# Altium PCB InterfaceBoard_MPCB.PcbDoc (part 1 of 3)
Units mil, origin at the board's own origin, x right, y up, seen from the top; angles counter-clockwise.
Board outline 1629.92 x 1653.54 mil, 4 copper layers (Top Layer, Power, Ground, Bottom Layer), stack 61.899 mil thick; 94 components, 58 nets, 296 pads, 186 vias.
Unrouted connection lines stored in the file: 1.
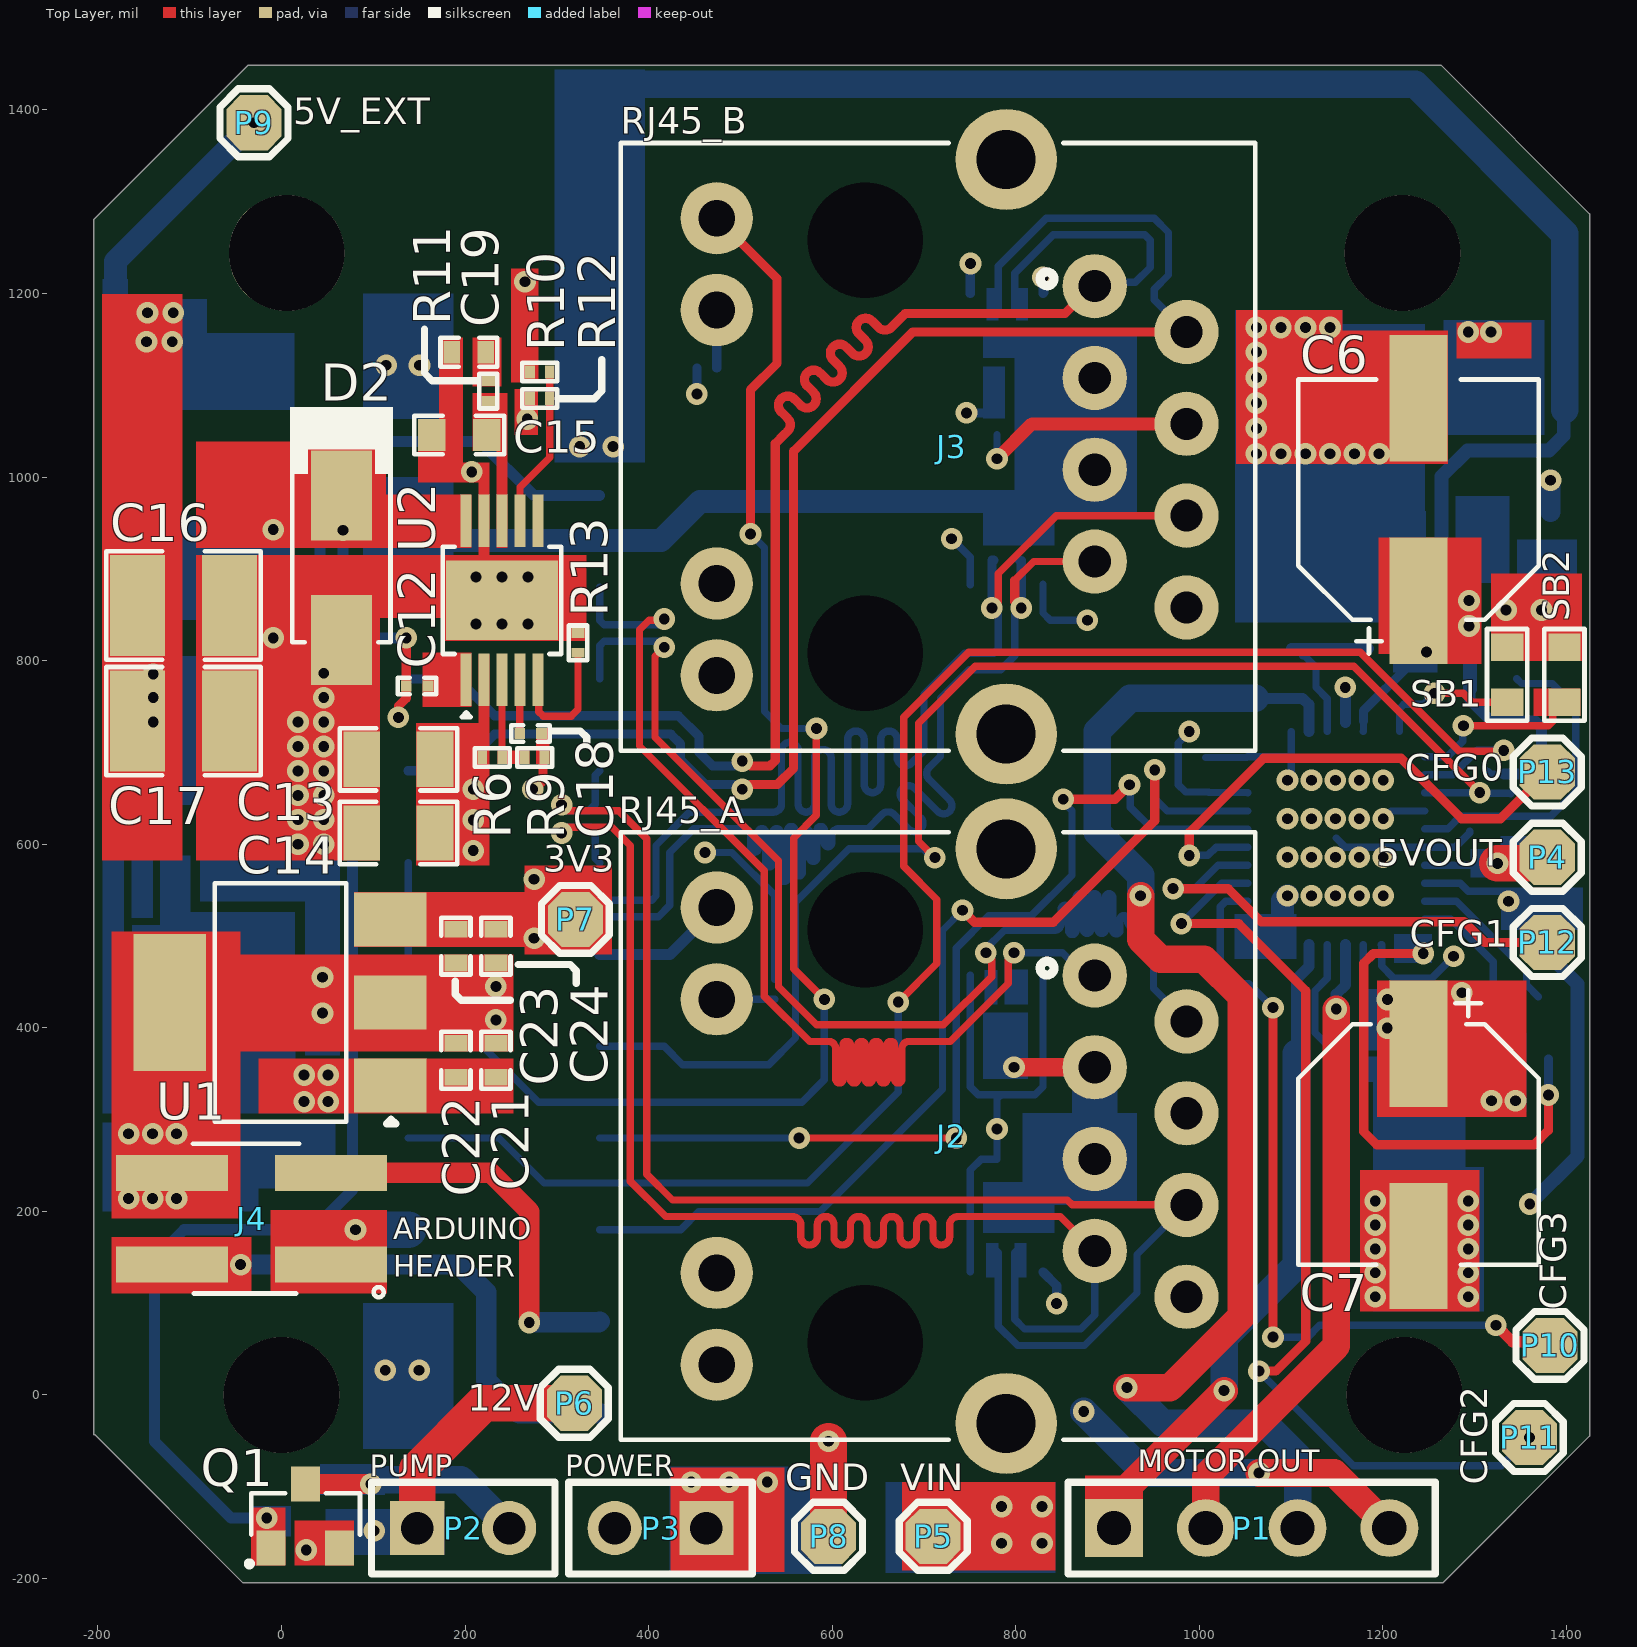
[diagram p0: Top Layer view]
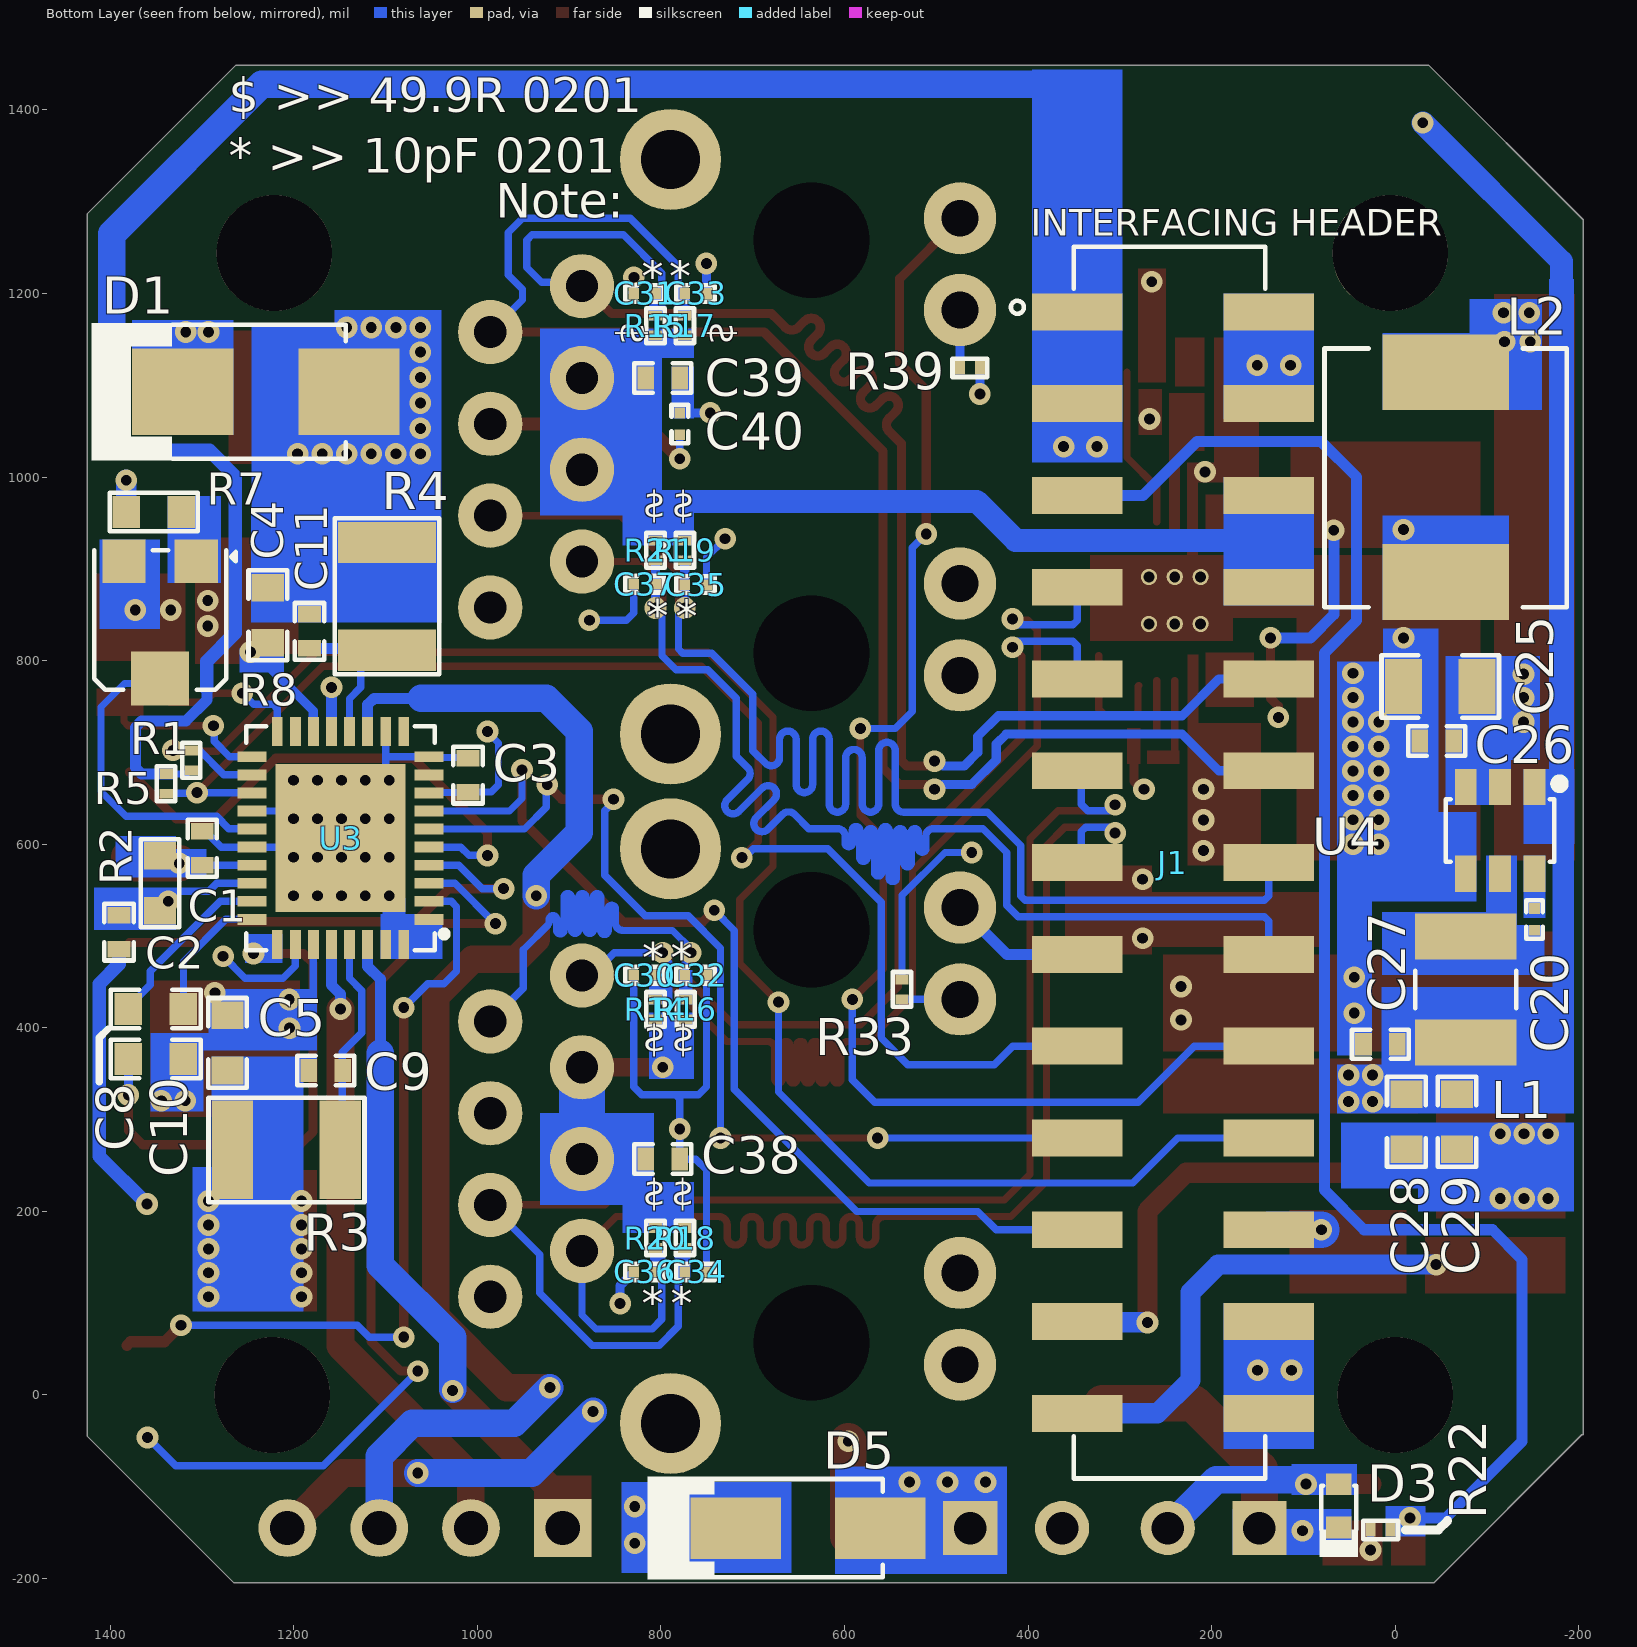
[diagram p1: Bottom Layer view, seen from below]
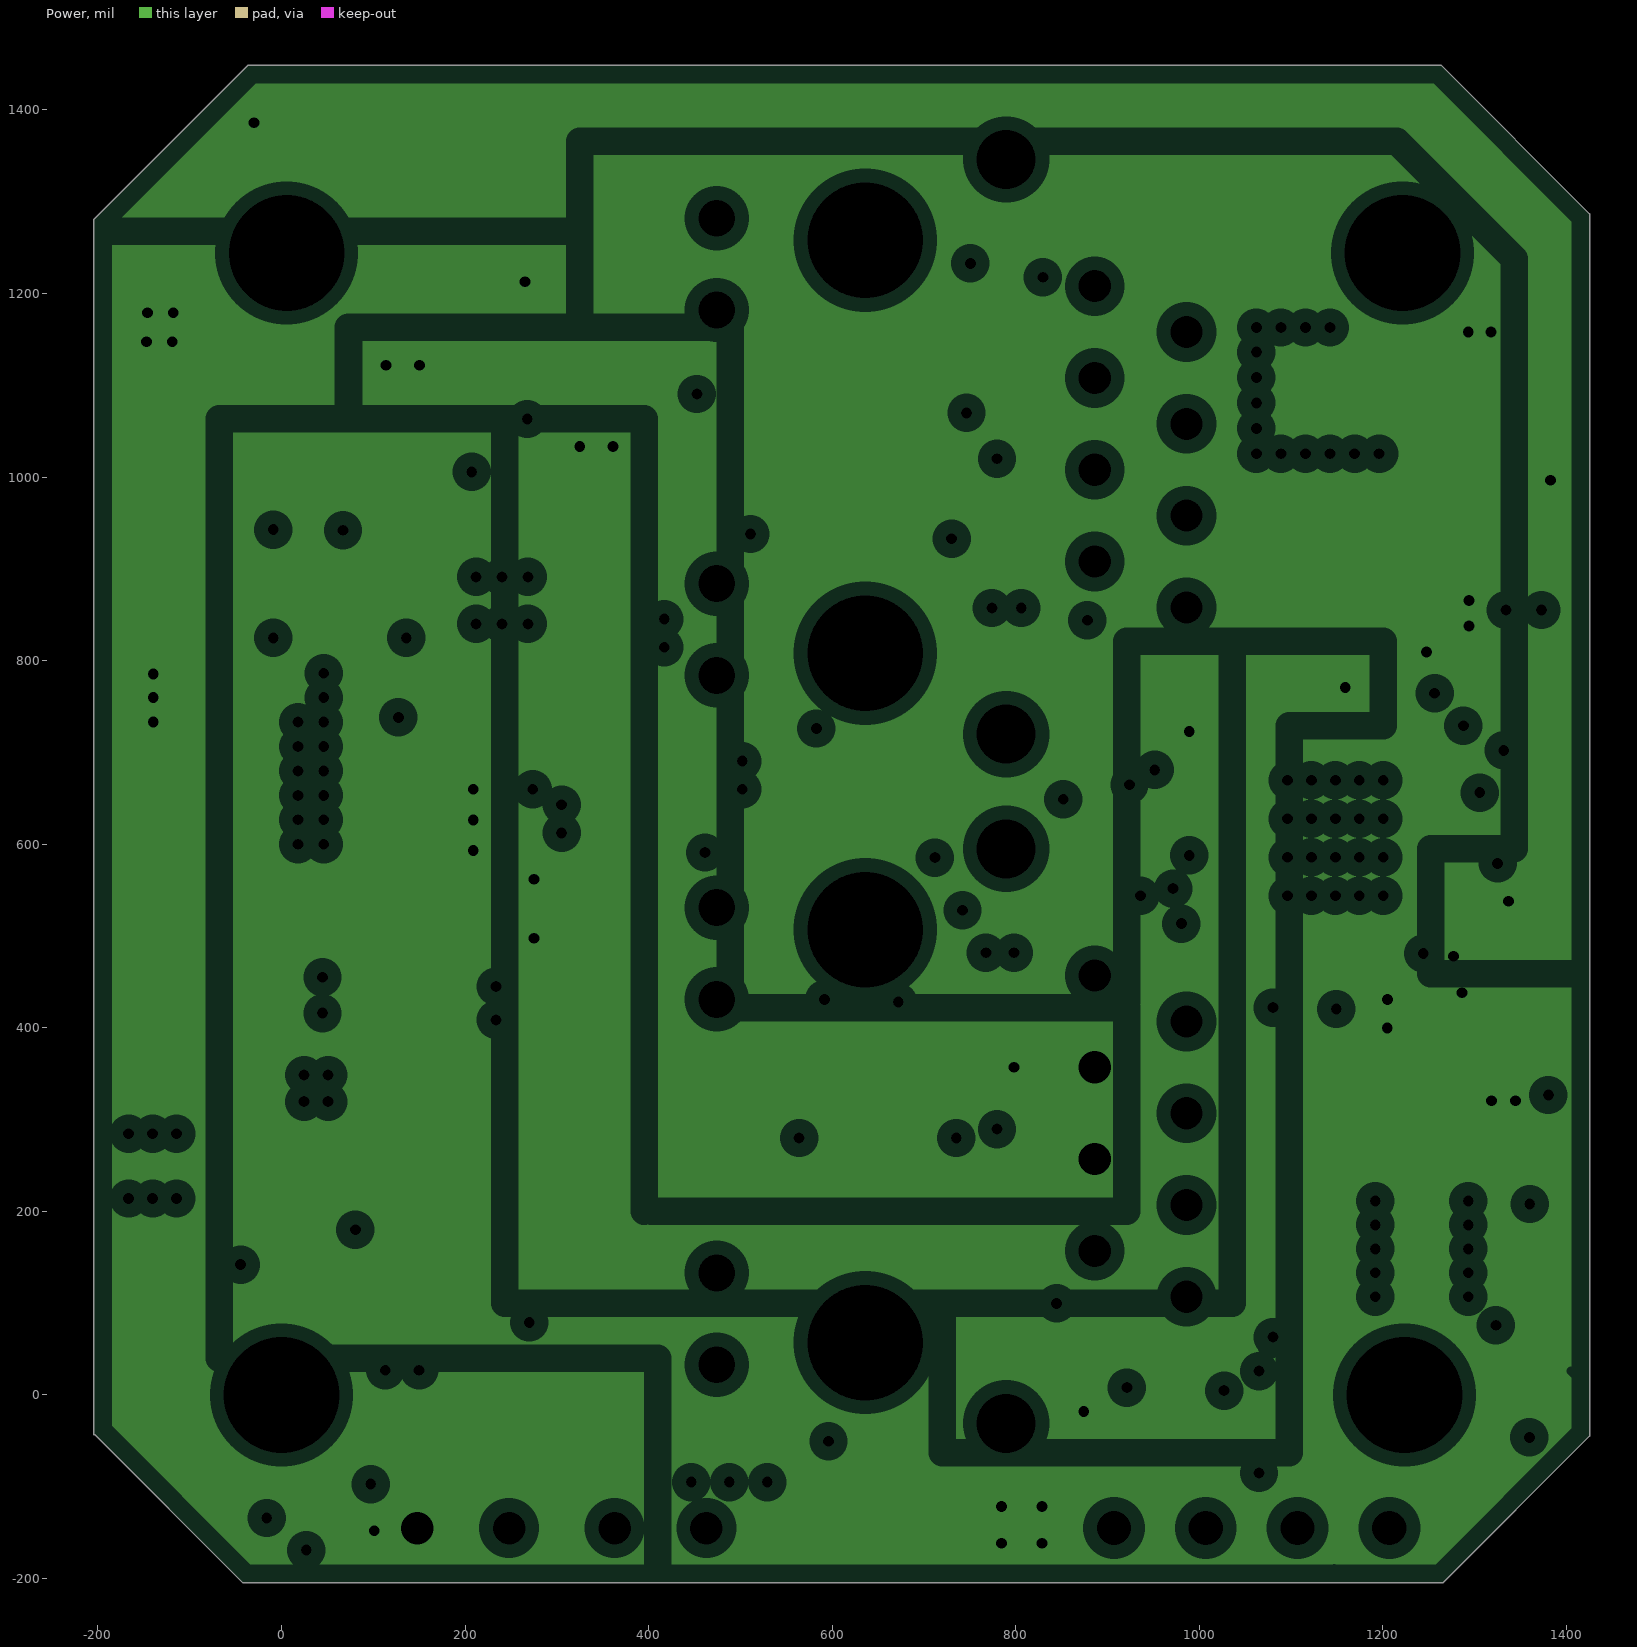
[diagram p2: Power, clearances drawn from the general rule]
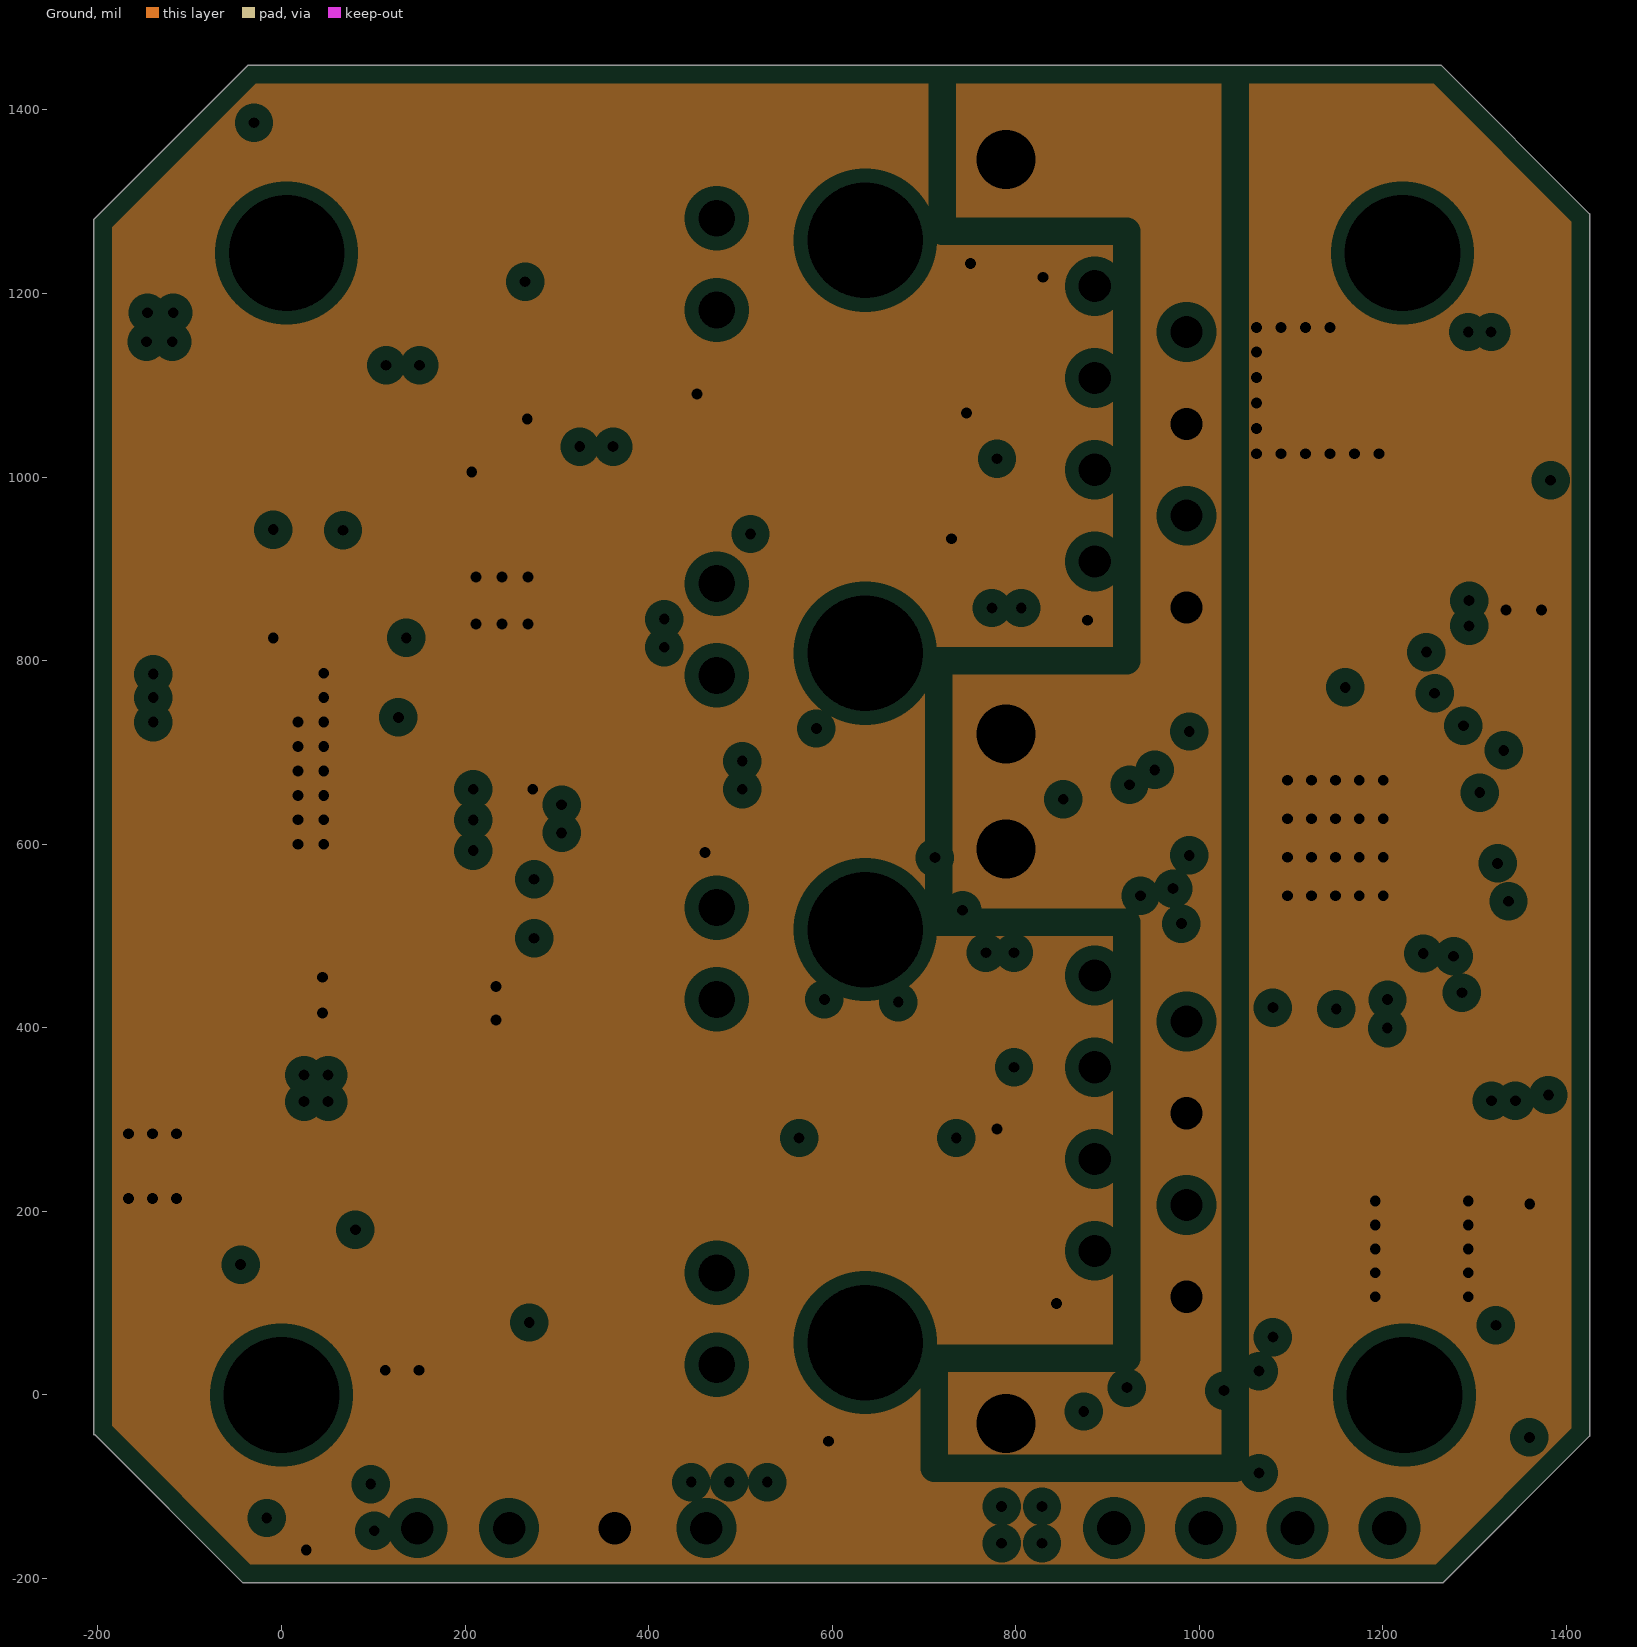
[diagram p3: Ground, clearances drawn from the general rule]
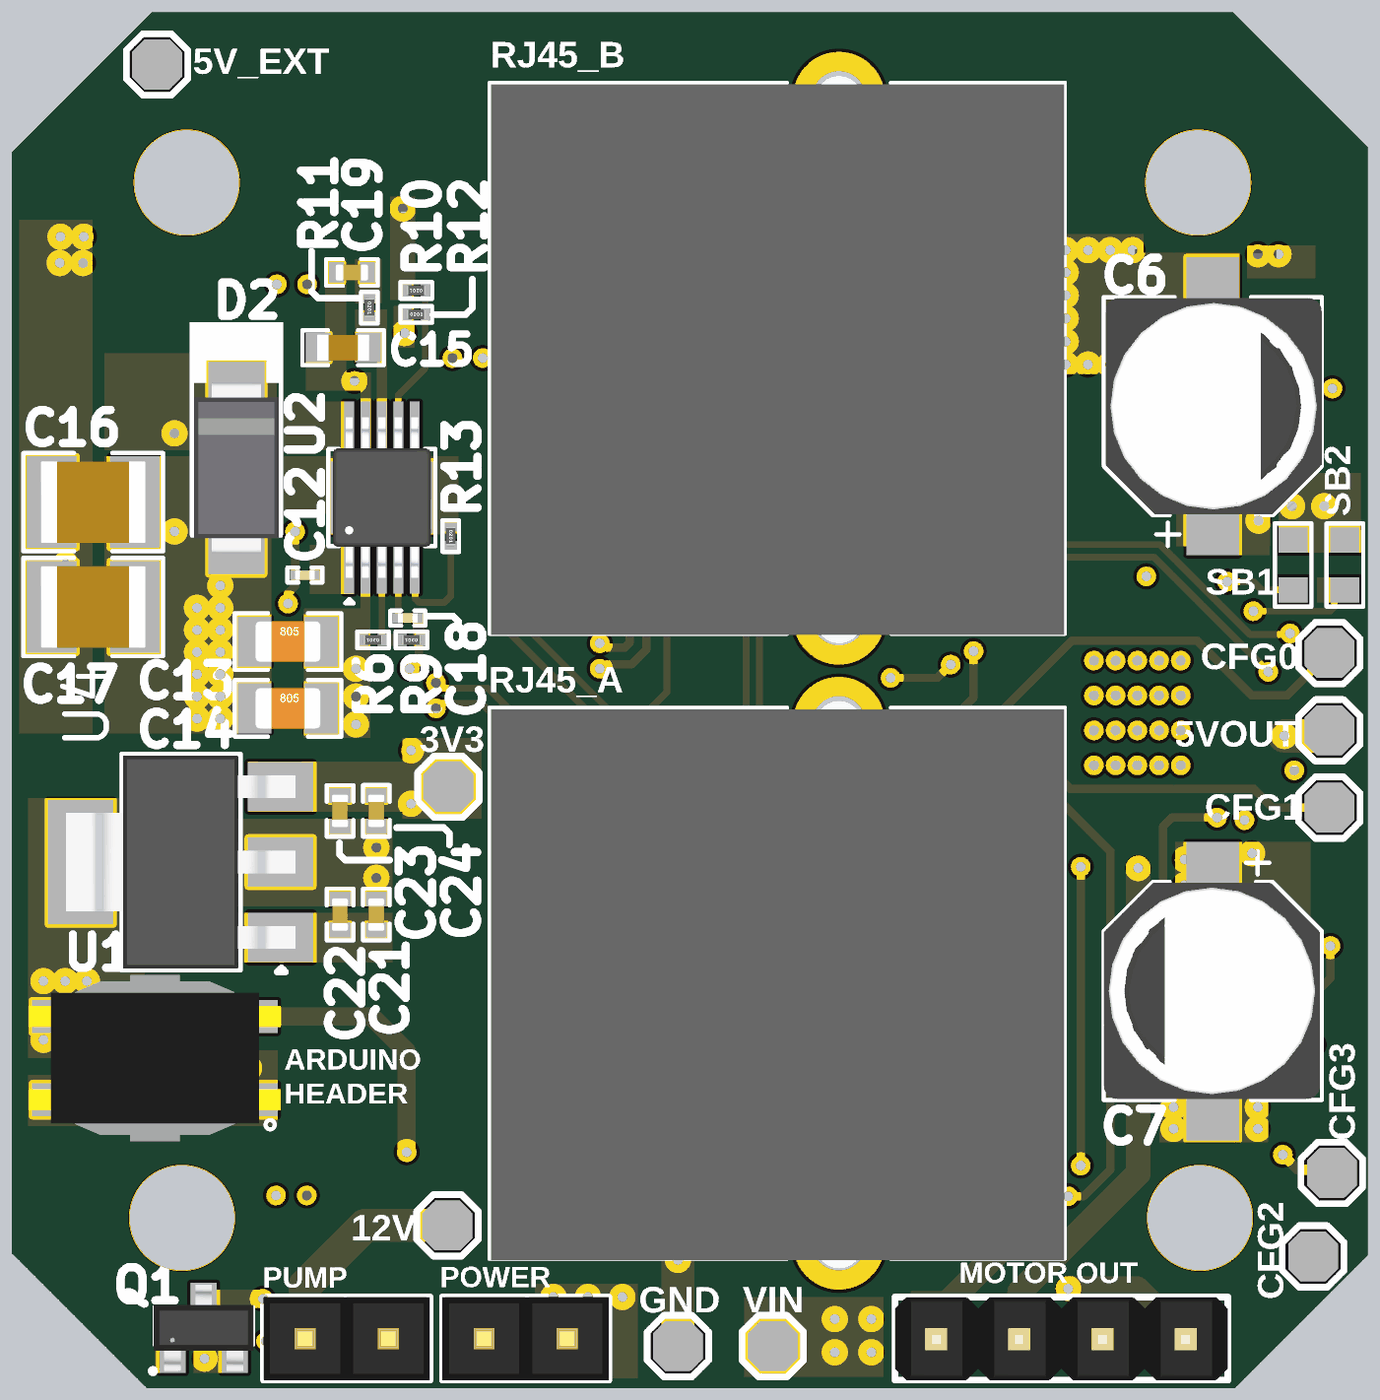
[diagram p5: 3D render of the assembled board from above, using the file's embedded part models]
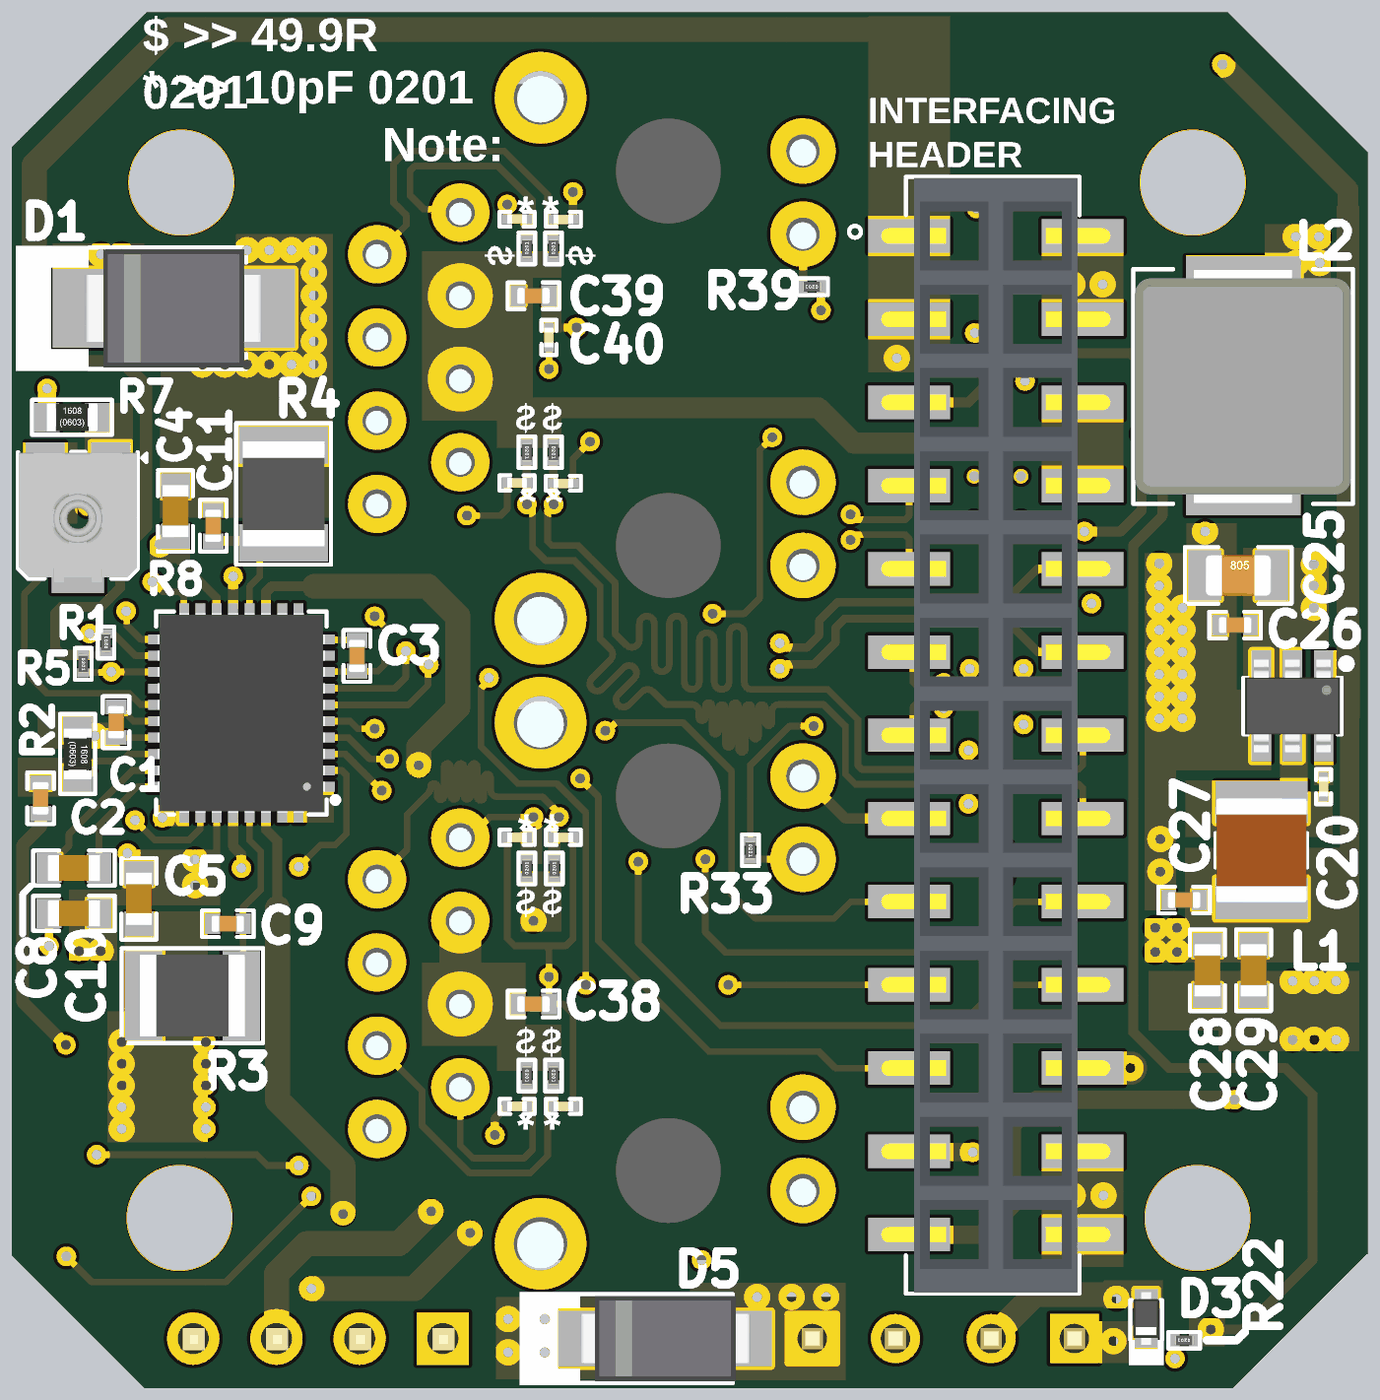
[diagram p6: 3D render of the assembled board from below, using the file's embedded part models]

## Layer stack, top to bottom
Top Solder: solder mask 0.5, Solder Resist, Dk 3.5
Top Layer: signal copper 1.4
Dielectric 2: prepreg 7.874, PP-006, Dk 4.1
Power: plane copper 1.4, net (Multiple Nets)
Dielectric 1: core 40.551, FR-4, Dk 4.8
Ground: plane copper 1.4, net (Multiple Nets)
Dielectric 3: prepreg 7.874, PP-006, Dk 4.1
Bottom Layer: signal copper 1.4
Bottom Solder: solder mask 0.5, Solder Resist, Dk 3.5

## Board outline
-204.73,-43.35 -203.19,-43.35 -41.81,-204.72 1265.27,-204.72 1425.19,-44.8 1425.19,1286.73 1263.1,1448.82 -36.19,1448.82 -204.73,1280.28

## Design rules (kind name [scope] priority, off if disabled: settings)
Clearance Clearance_2 [InDifferentialPairClass('EtherCAT_B_Lines')] p1: gap=7 ignorepadtopadclearanceinfootprint=FALSE except(0: Arc-Hole Track-Hole SMDPad-Hole THPad-Hole Via-Hole Fill-Hole Poly-Hole Region-Hole Text-Hole; 3: Arc-SMDPad Track-SMDPad SMDPad-SMDPad)
Clearance Clearance_1 [InDifferentialPairClass('EtherCAT_A_Lines')] p2: gap=7 ignorepadtopadclearanceinfootprint=FALSE except(0: Arc-Hole Track-Hole SMDPad-Hole THPad-Hole Via-Hole Fill-Hole Poly-Hole Region-Hole Text-Hole; 3: Arc-SMDPad Track-SMDPad SMDPad-SMDPad)
Clearance [All] p3: gap=7 ignorepadtopadclearanceinfootprint=FALSE except(0: Arc-Hole Track-Hole SMDPad-Hole THPad-Hole Via-Hole Fill-Hole Poly-Hole Region-Hole Text-Hole; 3: Arc-SMDPad Track-SMDPad SMDPad-SMDPad)
DiffPairsRouting DiffPairsRouting_1 [InDifferentialPairClass('EtherCAT_A_Lines')] p1: maxlimit=10 minlimit=10 mostfreqgap=10 toplayer_minwidth=8 toplayer_maxwidth=22 toplayer_prefwidth=10 bottomlayer_minwidth=8 bottomlayer_maxwidth=22 bottomlayer_prefwidth=10 maxuncoupledlength=500
DiffPairsRouting [InDifferentialPairClass('EtherCAT_B_Lines')] p2: maxlimit=10 minlimit=10 mostfreqgap=10 toplayer_minwidth=8 toplayer_maxwidth=22 toplayer_prefwidth=10 bottomlayer_minwidth=8 bottomlayer_maxwidth=22 bottomlayer_prefwidth=10 maxuncoupledlength=500
HoleSize [All] p1: absolutevalues=TRUE maxlimit=1000 minlimit=1 maxpercent=80.000 minpercent=20.000
HoleToHoleClearance [All] p1: gap=0 allowstackedmicrovias=TRUE
MatchedLengths "Schematic Matched Net Lengths_1" [InNetClass('EtherCAT_B')] p1: tolerance=20 checknetsindiffpair=FALSE checkdiffpairvsdiffpair=TRUE checkxsignals=TRUE checkothers=TRUE
MatchedLengths "Schematic Matched Net Lengths" [InNetClass('EtherCAT_A')] p2: tolerance=20 checknetsindiffpair=FALSE checkdiffpairvsdiffpair=TRUE checkxsignals=TRUE checkothers=TRUE
MatchedLengths MatchedLengths_1 [InDifferentialPairClass('EtherCAT_B_Lines')] p3: tolerance=20 checknetsindiffpair=FALSE checkdiffpairvsdiffpair=TRUE checkxsignals=TRUE checkothers=TRUE
MatchedLengths [InDifferentialPairClass('EtherCAT_A_Lines')] p4: tolerance=20 checknetsindiffpair=FALSE checkdiffpairvsdiffpair=TRUE checkxsignals=TRUE checkothers=TRUE
MaxMinImpedance "Schematic Impedance Constraint_1" [InNetClass('EtherCAT_A')] p1: minimum=85.00 maximum=95.00
MaxMinImpedance "Schematic Impedance Constraint" [InNetClass('EtherCAT_B')] p2: minimum=85.00 maximum=95.00
MinimumSolderMaskSliver [All] p1: minsoldermaskwidth=0
PlaneClearance [All] p1: clearance=15
PlaneConnect [All] p1: planeconnectstyle=Direct reliefexpansion=15 reliefentries=4 reliefconductorwidth=10 reliefairgap=10
PolygonConnect [All] p1: connectstyle=Direct reliefconductorwidth=10 reliefentries=4 polygonreliefangle="90 Angle" airgapwidth=10
RoutingVias [All] p1: holewidth=11.81 width=23.62 viastyle="Through Hole" minholewidth=11.81 minwidth=23.62 maxholewidth=11.81 maxwidth=23.62
SilkToSilkClearance [All] p1: silktosilkclearance=0
SilkToSolderMaskClearance [IsPad] p1: minsilkscreentomaskgap=0 clearancetoexposedcopper=TRUE
SolderMaskExpansion [All] p1: expansion=4 istentingtop=FALSE
UnRoutedNet [All] p1: checkbadconnections=TRUE
Width [All] p1: maxlimit=50 minlimit=8 preferedwidth=22 minimp=50.000000 maximp=50.000000 favimp=50.000000
21 further rules are at their usual default settings.

## Classes and differential pairs
differential pair class EtherCAT_B_Lines: RXB TXB
differential pair class EtherCAT_A_Lines: RXA TXA
net class EtherCAT_B: RXB_N RXB_P TXB_N TXB_P
net class EtherCAT_A: RXA_N RXA_P TXA_N TXA_P
component class U_Stepper-Driver: C1 C2 C3 C4 C5 C6 C7 C8 C9 C10 C11 D1 P4 P5 P7 P8 P9 P10 P11 P12 P13 R1 R2 R3 R4 R5 R7 R8 s SB1 SB2 U3
component class U_Power-Section: C12 C13 C14 C15 C16 C17 C18 C19 C20 C21 C22 C23 C24 C25 C26 C27 C28 C29 D2 l L1 L2 P6 R6 R9 R10 R11 R12 R13 U1 U2 U4
component class U_Connector_Section: C30 C31 C32 C33 C34 C35 C36 C37 C38 C39 C40 D3 D5 J1 J2 J3 J4 P1 P2 P3 Q1 R14 R15 R16 R17 R18 R19 R20 R21 R22 R33 R39
differential pair TXB: +TXB_P -TXB_N
differential pair TXA: +TXA_P -TXA_N
differential pair RXB: +RXB_P -RXB_N
differential pair RXA: +RXA_P -RXA_N

## Components (designator, comment, footprint, x,y, rotation, side; value= is the part's Value field where it differs from the comment)
C1 "4.7uF" Cap-0402 1299.75,595.69 r270 bottom locked
C2 "470nF" Cap-0402 1390.4,504.32 r90 bottom locked
C3 "0.1uF" Cap-0402 1010.24,675.36 r270 bottom locked
C4 "0.1uF" Cap0603 1228.34,849.36 r90 bottom locked
C5 "0.1uF" Cap0603 1272.25,383.48 r270 bottom locked
C6 "100uF" RVT1H101M0607 1238.84,975.6 r90 top locked
C7 "100uF" RVT1H101M0607 1238.84,272.53 r270 top locked
C8 "22nF" Cap0603 1350.24,420.46 r180 bottom locked
C9 "0.1uF" Cap-0402 1165.38,353.48 r180 bottom locked
C10 "0.1uF" Cap0603 1350.24,365.98 r180 bottom locked
C11 "0.1uF" Cap-0402 1183,831.86 r270 bottom locked
C12 "100nF" CAP-0201 147.74,772.49 r180 top locked
C13 "10uF" Cap-0805 127.36,692.57 r0 top locked
C14 "10uF" Cap-0805 127.36,612.31 r0 top locked
C15 "6.8pF" Cap-0603 193.61,1045.71 r0 top locked
C16 "100uF" Cap-1210 -106.75,860.1 r180 top locked
C17 "100uF" Cap-1210 -106.75,734.1 r180 top locked
C18 "6.8nF" CAP-0201 271.32,720.76 r180 top locked
C19 "3nF" Cap-0402 204.24,1136 r0 top locked
C20 "100nF" CAP-0201 -151.59,518.13 r270 bottom locked
C21 "1uF" Cap-0402 233.54,364.58 r270 top locked
C22 "0.1uF" Cap-0402 189.94,364.58 r270 top locked
C23 "0.1uF" Cap-0402 189.94,489.1 r90 top locked
C24 "1uF" Cap-0402 233.54,489.11 r90 top locked
C25 "10uF" Cap-0805 -49,772 r180 bottom locked
C26 "0.1uF" Cap-0402 -45.25,712.44 r180 bottom locked
C27 "0.1uF" Cap-0402 16.12,382.08 r180 bottom locked
C28 "22uF" Cap-0603 -12.03,297.58 r90 bottom locked
C29 "22uF" Cap-0603 -67.43,297.58 r90 bottom locked
C30 "10pF" CAP-0201 817.81,457.28 r0 bottom locked
C31 "10pF" CAP-0201 817.81,1200.05 r0 bottom locked
C32 "10pF" CAP-0201 762.2,457.28 r180 bottom locked
C33 "10pF" CAP-0201 762.2,1200.04 r180 bottom locked
C34 "10pF" CAP-0201 762.2,134.01 r180 bottom locked
C35 "10pF" CAP-0201 762.2,882.78 r180 bottom locked
C36 "10pF" CAP-0201 817.81,134.01 r0 bottom locked
C37 "10pF" CAP-0201 817.81,883.23 r0 bottom locked
C38 "22nF" Cap-0402 798,256.98 r180 bottom locked
C39 "22nF" Cap-0402 798,1108.01 r180 bottom locked
C40 "1nF" CAP-0201 779.5,1058.01 r90 bottom locked
D1 "SMBJ43A" SMB_ 1230.45,1093 r0 bottom locked
D2 "SS56" SMA 65.36,901.24 r270 top locked
D3 "MSK4010" MSK4010 61.66,-120.78 r270 bottom locked value=Custom
D5 "SS36" SMA 639.74,-145 r180 bottom locked
J1 "PHF254SMD-x" PHF254SMD-x 242.32,580 r270 bottom locked
J2 "HY951180A" HY951180A. 730.09,281.98 r90 top
J3 "HY951180A" HY951180A. 730.09,1033.01 r90 top locked
J4 "1125N1202SNM" 1125N1202SNM -32.62,192 r90 top locked
L1 "4.7uH" IND-1210 -76.79,441.71 r270 bottom locked
L2 "68uH" PSPMAA0605H-680M-IGF -54.87,1000.08 r90 bottom
P1 "B-2100S04P-A110" HDR1X4_ 906.99,-145 r0 top locked
P2 "826629-2" HDR1X2 147.99,-145 r0 top locked
P3 "826629-2" HDR1X2 462.99,-145 r180 top locked
P4 "Test Point" "TEST POINT" 1379,585.85 r0 top locked
P5 "Test Point" "TEST POINT" 710,-154 r270 top locked
P6 "Test Point" "TEST POINT" 319,-9 r0 top locked
P7 "Test Point" "TEST POINT" 320.2,518.13 r0 top locked
P8 "Test Point" "TEST POINT" 596,-154 r0 top locked
P9 "Test Point" "TEST POINT" -30,1386 r0 top locked
P10 "TEST POINT" Test-point 1382,54 r0 top locked
P11 "TEST POINT" Test-point 1359.5,-46.24 r0 top locked
P12 "TEST POINT" Test-point 1379,493 r0 top locked
P13 "TEST POINT" Test-point 1379,678.71 r0 top locked
Q1 "IRLML2502TRPBF" IRLML2502TRPBF 26,-132 r0 top locked
R1 "10K" Res-0201 1311.75,691.41 r90 bottom locked
R2 "10R" Res-0603 1345.88,557.5 r90 bottom locked
R3 "110mR" Res_1210 1208,267 r0 bottom locked
R4 "110mR" Res_1210 1098.39,870.02 r90 bottom locked
R5 "10K" Res-0201 1339.14,665.76 r270 bottom locked
R6 "105K" Res-0201 229.57,694.58 r180 top locked value=105kR
R7 "20K" Res-0603 1352.64,962 r0 bottom locked
R8 "DNP" VG039NCHXTB203 1345.64,844.44 r0 bottom locked
R9 "7.87k" Res-0201 275.83,694.57 r180 top locked
R10 "140K" Res-0201 281.52,1114.49 r180 top locked
R11 "105K" Res-0201 225.24,1093.72 r270 top locked value=105kR
R12 "10K" Res-0201 281.52,1085.72 r0 top locked
R13 "681K" Res-0201 323.01,819.31 r270 top locked
R14 "49.9R" Res-0201 806,420 r90 bottom locked
R15 "49.9R" Res-0201 806,1165 r90 bottom locked
R16 "49.9R" Res-0201 773.02,420 r90 bottom locked
R17 "49.9R" Res-0201 774.02,1165 r90 bottom locked
R18 "49.9R" Res-0201 774.02,171 r270 bottom locked
R19 "49.9R" Res-0201 774.02,920.18 r270 bottom locked
R20 "49.9R" Res-0201 806,171 r270 bottom locked
R21 "49.9R" Res-0201 806,920.18 r270 bottom locked
R22 "10K" Res-0201 16,-147 r0 bottom locked
R33 "330R" Res-0201 537.35,441.83 r270 bottom locked
R39 "330R" Res-0201 463.36,1119 r0 bottom locked
SB1 "Solder Bridge" "Solder Bridge" 1335.39,784.53 r90 top locked
SB2 "Solder Bridge" "Solder Bridge" 1397.64,784.53 r90 top locked
U1 "BL8071CLATR33" "SOT- 223" -1.63,427.58 r90 top locked
U2 "TPS54240DGQR" "10-HVSSOP - New" 240.24,865.62 r90 top locked
U3 "TMC2130-LA-T" TMC2130-LA-T 1149.13,606.72 r0 bottom locked
U4 "AP63205WU-7" TSOT-23-6 -114.19,615.08 r270 bottom locked

## Footprints (in the part's own frame and the unit in brackets; to place one, negate y for a bottom-side part, rotate by r counter-clockwise, add the part's x,y. Pads: shape width x height; smd on the part's side, far side on the other; paste and mask are expansions set on the pad)
"10-HVSSOP - New" [mm] "IC BATT CHG LI-ION 1CELL 10MSOP"
  rect 1.45x0.3 smd: 1(-2.2,1) 2(-2.2,0.5) 3(-2.2,0) 4(-2.2,-0.5) 5(-2.2,-1) 6(2.2,-1) 7(2.2,-0.5) 8(2.2,0) 9(2.2,0.5) 10(2.2,1)
  round 0.45 hole 0.3: 11(-0.65,-0.716) 11(-0.65,0) 11(-0.65,0.716) 11(0.65,-0.716) 11(0.65,0) 11(0.65,0.716)
  rect 2.2x3.1 smd: 11(0,0)
  silkscreen extent -3.23,-1.64 1.48,1.64, body extent -2.45,-1.5 2.45,1.5, height 1.1
1125N1202SNM [mm] "CONN HEADER 4 POS 2.54mm SMD"
  rect 1x3.1 smd: 1(-1.27,-2.2) 2(-1.27,2.2) 3(1.27,-2.2) 4(1.27,2.2)
  silkscreen extent -2.17,-3.66 2.07,1.62, body extent -2.54,-3.85 2.54,3.85, height 10.88
Cap0603 [mil]
  rect 30x35 smd mask+2.36: 1(-30,0) 2(30,0)
  silkscreen extent -49,-21 49,21, body extent -32,-16 31,16, height 34
CAP-0201 [mm]
  rect 0.3x0.3 smd mask+0.055: 1(-0.3,0) 2(0.3,0)
  silkscreen extent -0.53,-0.23 0.53,0.23, body extent -0.3,-0.15 0.3,0.15, height 0.28
Cap-0402 [mil]
  rect 18x25 smd mask+2.36: 1(-18.5,0) 2(18.5,0)
  silkscreen extent -31,-16 31,16, body extent -20,-10 20,10, height 19
Cap-0603 [mil]
  rect 30x35 smd mask+2.36: 1(-30,0) 2(30,0)
  silkscreen extent -49,-21 49,21, body extent -32,-16 31,16, height 34
Cap-0805 [mil] "SMD 0805"
  rect 40x60 smd mask+2.76: 1(-40,0) 2(40,0)
  silkscreen extent -64,-34 64,34, body extent -39,-25 39,25, height 30
Cap-1210 [mil] "SMD 1210"
  rect 60x110 smd: 1(-50,0) 2(50,0)
  silkscreen extent -84,-59 84,59, body extent -63,-49 63,49, height 39
HDR1X2 [mm] "CONN HEADER VERT 2POS 2.54MM"
  rect 1.5x1.5 hole 0.9: 1(0,0)
  round 1.5 hole 0.9: 2(2.54,0)
  silkscreen extent -1.27,-1.27 3.81,1.27, body extent -1.27,-1.27 3.81,1.27, height 8.44
HDR1X4_ [mm] "Connector; Header; 4 Position"
  rect 1.6x1.6 hole 0.95: 1(0,0)
  round 1.6 hole 0.95: 2(2.54,0) 3(5.08,0) 4(7.62,0)
  silkscreen extent -1.27,-1.27 8.89,1.27, body extent -1.27,-1.27 8.89,1.27, height 9.5
HY951180A. [mm]
  round 1.78 hole 0.89: 1(4.445,-3.96) 2(3.175,-6.5) 3(1.905,-3.96) 4(0.635,-6.5) 5(-0.635,-3.96) 6(-1.905,-6.5) 7(-3.175,-3.96) 8(-4.445,-6.5)
  round 2 hole 1.02: 9(6.325,6.5) 10(3.785,6.5) 11(-3.785,6.5) 12(-6.325,6.5)
  round 0 hole 3.2 unplated: MH1(-5.715,2.39) MH2(5.715,2.39)
  round 2.8 hole 1.63: "Shield 1"(-7.95,-1.51) "Shield 2"(7.95,-1.51)
  silkscreen extent -8.41,-8.41 8.41,9.16, body extent -8.7,-8.38 8.62,9.12, height 17.6
IND-1210 [mm]
  rect 1.27x2.81 smd: 1(-1.471,0) 2(1.471,0)
  silkscreen extent -0.52,-1.4 0.52,1.4, body extent -1.6,-1.4 1.6,1.4, height 2.5
IRLML2502TRPBF [mm] "MOSFET N-CH 20V 4.2A SOT23"
  rect 0.802x0.972 smd: 1(-0.95,-0.885) 2(0.95,-0.885) 3(0,0.885)
  silkscreen extent -1.57,-1.35 1.51,0.64, body extent -1.52,-1.32 1.52,1.32, height 1.12
MSK4010 [mm] "SOD-523 Schottky Barrier Diodes (SBD) ROHS"
  rect 0.6x0.7 smd: 1(-0.6,0) 2(0.6,0)
  silkscreen extent -0.56,-0.53 1.42,0.53, body extent -0.8,-0.4 0.8,0.4, height 0.7
PHF254SMD-x [mm]
  rect 1.02x2.5 smd: 1(-15.24,-2.65) 2(-15.24,2.65) 3(-12.7,-2.65) 4(-12.7,2.65) 5(-10.16,-2.65) 6(-10.16,2.65) 7(-7.62,-2.65) 8(-7.62,2.65) 9(-5.08,-2.65) 10(-5.08,2.65) 11(-2.54,-2.65) 12(-2.54,2.65) 13(0,-2.65) 14(0,2.65) 15(2.54,-2.65) 16(2.54,2.65) 17(5.08,-2.65) 18(5.08,2.65) 19(7.62,-2.65) 20(7.62,2.65) 21(10.16,-2.65) 22(10.16,2.65) 23(12.7,-2.65) 24(12.7,2.65) 25(15.24,-2.65) 26(15.24,2.65)
  silkscreen extent -17.04,-4.48 17.04,2.55, body extent -17.01,-3.5 17.01,3.5, height 8.5
PSPMAA0605H-680M-IGF [mm]
  rect 2.1x3.5 smd: 1(-2.9,0) 2(2.9,0)
  silkscreen extent -3.61,-3.35 3.56,3.35, body extent -3.57,-3.29 3.53,3.31, height 5
Res-0201 [mm]
  rect 0.27x0.37 smd mask+0.055: 1(-0.275,0) 2(0.275,0)
  silkscreen extent -0.48,-0.25 0.48,0.25, body extent -0.3,-0.15 0.3,0.15, height 0.29
Res-0603 [mil]
  rect 30x35 smd: 1(-30,0) 2(30,0)
  silkscreen extent -48,-21 48,21, body extent -31,-17 31,17, height 18
Res_1210 [mm]
  rect 1.14x2.72 smd: 1(-1.49,0) 2(1.49,0)
  silkscreen extent -2.16,-1.45 2.16,1.45, body extent -1.6,-1.25 1.6,1.25, height 0.7
RVT1H101M0607 [mm]
  rect 3.5x1.6 smd: 1(-2.8,0) 2(2.8,0)
  silkscreen extent -4.27,-3.33 3.32,3.33, body extent -3.31,-3.33 3.29,3.27, height 7.94
SMA [mm]
  rect 2.5x1.7 smd: 1(-2,0) 2(2,0)
  silkscreen extent -4.44,-1.42 2.06,1.42, body extent -2.6,-1.3 2.6,1.3, height 2.4
SMB_ [mm]
  rect 2.8x2.4 smd: 1(-2.3,0) 2(2.3,0)
  silkscreen extent -2.21,-1.91 4.83,1.91, body extent -2.7,-1.8 2.7,1.8, height 2.3
"Solder Bridge" [mil] "Solder Bridge ON"
  rect 30x35 smd: 1(-30,0) 2(30,0)
  silkscreen extent -50,-22 50,22
"SOT- 223" [mm]
  rect 1.5x2 smd: 1(-2.3,-3.05) 2(0,-3.05) 3(2.3,-3.05)
  rect 3.8x2 smd: 4(0,3.05)
  silkscreen extent -3.35,-3.2 3.3,1.8, body extent -3.25,-3.5 3.25,3.5, height 1.61
"TEST POINT" [mil]
  oct 60x60 smd: 1(0,0)
  silkscreen extent -37,-37 37,37
Test-point [mil]
  oct 60x60 smd: 1(0,0)
  silkscreen extent -37,-37 37,37
TMC2130-LA-T [mm]
  rect 0.8x0.3 smd: 1(-2.45,2.25) 2(-2.45,1.75) 3(-2.45,1.25) 4(-2.45,0.75) 5(-2.45,0.25) 6(-2.45,-0.25) 7(-2.45,-0.75) 8(-2.45,-1.25) 9(-2.45,-1.75) 10(-2.45,-2.25) 19(2.45,-2.25) 20(2.45,-1.75) 21(2.45,-1.25) 22(2.45,-0.75) 23(2.45,-0.25) 24(2.45,0.25) 25(2.45,0.75) 26(2.45,1.25) 27(2.45,1.75) 28(2.45,2.25)
  rect 0.3x0.8 smd: 11(-1.75,-2.95) 12(-1.25,-2.95) 13(-0.75,-2.95) 14(-0.25,-2.95) 15(0.25,-2.95) 16(0.75,-2.95) 17(1.25,-2.95) 18(1.75,-2.95) 29(1.75,2.95) 30(1.25,2.95) 31(0.75,2.95) 32(0.25,2.95) 33(-0.25,2.95) 34(-0.75,2.95) 35(-1.25,2.95) 36(-1.75,2.95)
  rect 3.6x4.1 smd: 37(0,0)
  silkscreen extent -2.92,-3.1 2.6,3.1, body extent -2.55,-3.05 2.55,3.05, height 0.84
TSOT-23-6 [mm]
  rect 1x0.6 smd: 1(-1.2,0.95) 2(-1.2,0) 3(-1.2,-0.95) 4(1.2,-0.95) 5(1.2,0) 6(1.2,0.95)
  silkscreen extent -0.86,-1.5 0.86,1.5, body extent -1.41,-1.45 1.41,1.45, height 1
VG039NCHXTB203 [mm]
  rect 1.2x1.2 smd: 1(-1,-1.625) 3(1,-1.625)
  rect 1.6x1.5 smd: 2(0,1.625)
  silkscreen extent -2.09,-1.93 1.83,1.94, body extent -1.8,-1.91 1.8,2.05, height 1.13

## Part data
C1: library part CC0402KRX5R6BB475, "CAP CER 4.7UF 10V X5R 0402", Case Code (Imperial)=0402, Case Code (Metric)=1005, LCSC Part Number=C326586, Manufacturer=Yageo, Max Operating Temperature=85°C, Min Operating Temperature=-55°C, Supplier Part Number 1=3871698, Tolerance=10%, Voltage Rating=10V, Capacitance=4.7uF, Case/Package=0402, Category="Ceramic Capacitors", ComponentLink1Description=http://www.yageo.com/documents/recent/UPY-GPHC_X5R_4V-to-50V_25.pdf?src-supplier=Digi-Key, ComponentLink1URL=http://www.yageo.com/documents/recent/UPY-GPHC_X5R_4V-to-50V_25.pdf?src-supplier=Digi-Key, Manufacturer Part Number=CC0402KRX5R6BB475, Mount="Surface Mount", Packaging="Cut Tape", Pricing 1="10000=0.02310, 50000=0.02100 (GBP)", RoHS=Yes, RoHS Compliant=Yes, Stock 1=20000, Supplier 1=Farnell
C2: library part CC0402KRX5R7BB474, "CAP CER 0.47UF 16V X5R 0402", Case/Package=0402, LCSC Part Number=C527010, Manufacturer=Yageo, Max Operating Temperature=85°C, Min Operating Temperature=-55°C, Supplier Part Number 1=1070400, Tolerance=10%, Voltage Rating=16V, Capacitance=470nF, Category="Ceramic Capacitors", ComponentLink1Description=http://www.yageo.com/documents/recent/UPY-GPHC_X5R_4V-to-50V_25.pdf?src-supplier=Digi-Key, ComponentLink1URL=http://www.yageo.com/documents/recent/UPY-GPHC_X5R_4V-to-50V_25.pdf?src-supplier=Digi-Key, ComponentLink2Description=http://www.yageo.com/exep/pages/download/literatures/ProductSelectionGuide%202014_Final_2.pdf?src-supplier=Digi-Key, ComponentLink2URL=http://www.yageo.com/exep/pages/download/literatures/ProductSelectionGuide%202014_Final_2.pdf?src-supplier=Digi-Key, Halogen Free="Halogen Free", Item Type=Capacitor, Lead Free="Lead Free", Length=0.039inch, Manufacturer Part Number=CC0402KRX5R7BB474, Mount="Surface Mount", Packaging="Tape and Reel", Pricing 1="10000=0.01840, 20000=0.01800, 40000=0.01760, 50000=0.01750, 150000=0.01670 (USD)", RoHS=Yes, RoHS Compliant=Yes, Stock 1=10000, Supplier 1="Future Electronics", Thickness=0.022inch, Voltage Rating (DC)=16V, Width=0.02inch
C3 C9 C11 C22 C23 C26 C27: library part CC0402KRX7R8BB104, "CAP CER 0.1UF 25V X7R 0402", Capacitance=100nF, Case Code (Imperial)=0402, Case Code (Metric)=1005, Dielectric=X7R, LCSC Part Number=C105883, Manufacturer=Yageo, Max Operating Temperature=125°C, Min Operating Temperature=-55°C, Resistor Type=Ceramic, Supplier Part Number 1=311-2077-1-ND, Tolerance=10%, Voltage Rating=25V, Case/Package=0402, Category="Ceramic Capacitors", ComponentLink1Description=https://datasheet.ciiva.com/11464/upy-gphc-x7r-6-3v-to-50v-8-11464889.pdf?src-supplier=Avnet, ComponentLink1URL=https://datasheet.ciiva.com/11464/upy-gphc-x7r-6-3v-to-50v-8-11464889.pdf?src-supplier=Avnet, ComponentLink2Description=https://datasheet.ciiva.com/13210/upy-gphc-x7r-6-3v-to-50v-8-12304-13210908.pdf?src-supplier=Mouser, ComponentLink2URL=https://datasheet.ciiva.com/13210/upy-gphc-x7r-6-3v-to-50v-8-12304-13210908.pdf?src-supplier=Mouser, ComponentLink3Description=https://datasheet.ciiva.com/17437/upy-gphc-x7r-6-3v-to-50v-8-17437357.pdf?src-supplier=Avnet+Europe, ComponentLink3URL=https://datasheet.ciiva.com/17437/upy-gphc-x7r-6-3v-to-50v-8-17437357.pdf?src-supplier=Avnet+Europe, Depth=0.5mm, Dissipation Factor=3.5%, Halogen Free="Halogen Free", Height=0.5mm, Lead Free="Lead Free", Length=1mm, Manufacturer Part Number=CC0402KRX7R8BB104, Mount="Surface Mount", Packaging="Tape and Reel", Pricing 1="1=0.10000, 10=0.03100, 50=0.01700, 100=0.01390, 500=0.00990, 1000=0.00777, 2500=0.00707, 5000=0.00650 (USD)", Radiation Hardening=No, RoHS=Yes, Stock 1=1841009, Supplier 1=Digi-Key, Termination=SMD/SMT, Thickness=0.022inch, Voltage Rating (DC)=25V, Width=0.02inch
C4 C5 C10: library part CC0603KRX7R0BB104, "CAP CER 0.1UF 100V X7R 0603", Capacitance=100nF, Case Code (Imperial)=0603, Case Code (Metric)=1608, Dielectric=X7R, Manufacturer=Yageo, Max Operating Temperature=125°C, Min Operating Temperature=-55°C, Package Quantity=4000, Resistor Type=Ceramic, Supplier Part Number 1=311-1523-1-ND, Tolerance=10%, Voltage Rating=100V, Case/Package=0603, Category="Ceramic Capacitors", ComponentLink1Description=https://datasheet.ciiva.com/6277/mlccorderingcode-6277030.pdf?src-supplier=Digi-Key, ComponentLink1URL=https://datasheet.ciiva.com/6277/mlccorderingcode-6277030.pdf?src-supplier=Digi-Key, ComponentLink2Description=https://datasheet.ciiva.com/6277/mlccorderingcode-6277081.pdf?src-supplier=Digi-Key, ComponentLink2URL=https://datasheet.ciiva.com/6277/mlccorderingcode-6277081.pdf?src-supplier=Digi-Key, ComponentLink3Description=https://datasheet.ciiva.com/6277/mlccorderingcode-6277082.pdf?src-supplier=Digi-Key, ComponentLink3URL=https://datasheet.ciiva.com/6277/mlccorderingcode-6277082.pdf?src-supplier=Digi-Key, Depth=0.8mm, Lead Free="Lead Free", Length=0.063inch, Manufacturer Part Number=CC0603KRX7R0BB104, Mount="Surface Mount", Packaging="Tape and Reel", Pricing 1="1=0.19000, 10=0.13500, 50=0.07680, 100=0.06370, 500=0.04466, 1000=0.03696 (USD)", RoHS=Yes, RoHS Compliant=Yes, Series=CC, Stock 1=60476, Supplier 1=Digi-Key, Termination=SMD/SMT, Thickness=0.035inch, Voltage Rating (DC)=100V, Weight=7.1E-05oz, Width=0.031inch
C6 C7: library part RVT1H101M0607, "100uF 50V ±20% SMD,D6.3xL7.7mm Aluminum Electrolytic Capacitors - SMD ROHS", LCSC Part Number=C3151829, Manufacturer=ROQANG, Package=SMD,D6.3xL7.7mm, ComponentLink1Description=LCSC, ComponentLink1URL=https://www.lcsc.com/product-detail/Aluminum-Electrolytic-Capacitors-SMD_ROQANG-RVT1H101M0607_C3151829.html, Item Type=Capacitor, Manufacturer Part Number=RVT1H101M0607
C8: library part CGA3E2X7R2A223K080AA, "CAP CER 0.022UF 100V X7R 0603", Case Code (Imperial)=0603, Case Code (Metric)=1608, Dielectric=X7R, Manufacturer=TDK, Max Operating Temperature=125°C, Min Operating Temperature=-55°C, Package Quantity=1, Ratings=AEC-Q200, Resistor Type=Ceramic, Supplier Part Number 1=445-5814-1-ND, Tolerance=10%, Voltage Rating=100V, Capacitance=22nF, Case/Package=0603, Category="Ceramic Capacitors", ComponentLink1Description=https://datasheet.ciiva.com/22725/1735406-22725648.pdf?src-supplier=Element14, ComponentLink1URL=https://datasheet.ciiva.com/22725/1735406-22725648.pdf?src-supplier=Element14, ComponentLink2Description=https://datasheet.ciiva.com/24218/cga3e2x7r2a223k080aa-266292-24218959.pdf?src-supplier=Mouser, ComponentLink2URL=https://datasheet.ciiva.com/24218/cga3e2x7r2a223k080aa-266292-24218959.pdf?src-supplier=Mouser, ComponentLink3Description=https://datasheet.ciiva.com/7975/1807242-7975349.pdf?src-supplier=Element14, ComponentLink3URL=https://datasheet.ciiva.com/7975/1807242-7975349.pdf?src-supplier=Element14, Depth=0.8mm, Height=0.8mm, Length=1.6mm, Manufacturer Part Number=CGA3E2X7R2A223K080AA, Mount="Surface Mount", Packaging="Tape and Reel", Pricing 1="1=0.11000, 10=0.07600, 50=0.04340, 100=0.03590, 500=0.02516, 1000=0.02083 (USD)", REACH SVHC="No SVHC", RoHS=Yes, RoHS Compliant=Yes, Series=CGA, Stock 1=56079, Supplier 1=Digi-Key, Termination=SMD/SMT, Thickness=0.035inch, Voltage Rating (DC)=100V, Weight=7.1E-05oz, Width=0.031inch
C12 C20: library part CC0201KRX5R6BB104, "CAP CER 0.1UF 10V X5R 0201", Case Code (Imperial)=0201, Case Code (Metric)=0603, Dielectric=X5R, LCSC Part Number=C190183, Manufacturer=Yageo, Max Operating Temperature=85°C, Min Operating Temperature=-55°C, Resistor Type=Ceramic, Supplier Part Number 1=603-CC201KRX5R6BB104, Tolerance=10%, Voltage Rating=10V, Capacitance=100nF, Case/Package=0201, Category="Ceramic Capacitors", ComponentLink1Description=https://datasheet.ciiva.com/11587/upy-gphc-x5r-4v-to-50v-12-11587190.pdf?src-supplier=Avnet, ComponentLink1URL=https://datasheet.ciiva.com/11587/upy-gphc-x5r-4v-to-50v-12-11587190.pdf?src-supplier=Avnet, Construction=Flat, Depth=0.3mm, Halogen Free="Halogen Free", Height=0.3mm, Lead Free="Lead Free", Length=0.6mm, Manufacturer Part Number=CC0201KRX5R6BB104, Mount="Surface Mount", Packaging="Tape and Reel", Pricing 1="1=0.10000, 10=0.02400, 50=0.02400, 100=0.01900, 1000=0.01100, 10000=0.00900 (USD)", Radiation Hardening=No, RoHS=Yes, RoHS Compliant=Yes, Series=CC, Stock 1=824403, Supplier 1=Mouser, Termination=SMD/SMT, Thickness=0.013inch, Voltage Rating (DC)=10V, Weight=6E-06oz, Width=0.012inch
C13 C14 C25: library part GRM21BR61H106ME43L, "CAP CER 10UF 50V X5R 0805", LCSC Part Number=C2190942, Manufacturer=Murata, Supplier Part Number 1=490-18664-1-ND, Category="Ceramic Capacitors", Manufacturer Part Number=GRM21BR61H106ME43L, Pricing 1="1=0.44000, 10=0.30700, 50=0.21500, 100=0.18420, 500=0.13818, 1000=0.11668 (USD)", RoHS=Yes, Stock 1=26, Supplier 1=Digi-Key
C15: library part CGA3E2C0G1H6R8D080AA, "CAP CER 6.8PF 50V C0G 0603", Case Code (Imperial)=0603, Case Code (Metric)=1608, Dielectric=C0G, LCSC Part Number=C2171569, Manufacturer=TDK, Max Operating Temperature=125°C, Min Operating Temperature=-55°C, Package Quantity=4000, Ratings=AEC-Q200, Resistor Type=Ceramic, Supplier Part Number 1=9155733, Voltage Rating=50V, Capacitance=6.8pF, Case/Package=0603, Category="Ceramic Capacitors", ComponentLink1Description=https://datasheet.ciiva.com/24219/cga3e2c0g1h6r8d080aa-265703-24219187.pdf?src-supplier=Mouser, ComponentLink1URL=https://datasheet.ciiva.com/24219/cga3e2c0g1h6r8d080aa-265703-24219187.pdf?src-supplier=Mouser, ComponentLink2Description=https://datasheet.ciiva.com/46424/1839935-46424221.pdf?src-supplier=Element14, ComponentLink2URL=https://datasheet.ciiva.com/46424/1839935-46424221.pdf?src-supplier=Element14, ComponentLink3Description=https://datasheet.ciiva.com/46424/1839935-46424222.pdf?src-supplier=Element14, ComponentLink3URL=https://datasheet.ciiva.com/46424/1839935-46424222.pdf?src-supplier=Element14, Depth=0.8mm, Height=0.8mm, Length=1.6mm, Manufacturer Part Number=CGA3E2C0G1H6R8D080AA, Mount="Surface Mount", Packaging="Tape and Reel", Pricing 1="200=0.07200, 2000=0.05400 (USD)", REACH SVHC="No SVHC", RoHS=Yes, Stock 1=1, Supplier 1=RSComponents, Termination=SMD/SMT, Thickness=0.035inch, Voltage Rating (DC)=50V, Weight=7.1E-05oz, Width=0.031inch
C16 C17: library part EMK325ABJ107MM-P, "CAP CER 100UF 16V X5R 1210", Case Code (Imperial)=1210, Case Code (Metric)=3225, LCSC Part Number=C90143, Manufacturer="Taiyo Yuden", Max Operating Temperature=85°C, Min Operating Temperature=-55°C, Supplier Part Number 1=587-5426-1-ND, Tolerance=20%, Voltage Rating=16V, Case/Package=1210, Category="Ceramic Capacitors", ComponentLink1Description=http://ds.yuden.co.jp/TYCOMPAS/ut/detail.do?productNo=EMK325ABJ107MM-P&fileName=EMK325ABJ107MM-P_SS&mode=specSheetDownload&src-supplier=Digi-Key, ComponentLink1URL=http://ds.yuden.co.jp/TYCOMPAS/ut/detail.do?productNo=EMK325ABJ107MM-P&fileName=EMK325ABJ107MM-P_SS&mode=specSheetDownload&src-supplier=Digi-Key, Item Type=Capacitor, Lead Free="Lead Free", Manufacturer Part Number=EMK325ABJ107MM-P, Mounting Technology="Surface Mount", Packaging="Cut Tape", Pricing 1="1=1.75, 10=1.415, 50=1.2352, 100=1.0809, 500=0.82352 (USD)", RoHS=Yes, RoHS Compliant=Yes, Series=M, Stock 1=81344, Supplier 1=Digi-Key
C18: library part 0201B682K500NT, "50V 6.8nF ±10% 0201 Multilayer Ceramic Capacitors MLCC - SMD/SMT ROHS", LCSC Part Number=C285015, Manufacturer="FH (Guangdong Fenghua Advanced Tech)", Package=0201, ComponentLink1Description=LCSC, ComponentLink1URL=https://www.lcsc.com/product-detail/Multilayer-Ceramic-Capacitors-MLCC-SMD-SMT_FH-Guangdong-Fenghua-Advanced-Tech-0201B682K500NT_C285015.html, Item Type=Capacitor, Manufacturer Part Number=0201B682K500NT
C19: library part 0402B302K500NT, "50V 3nF 0402 Multilayer Ceramic Capacitors MLCC - SMD/SMT ROHS", LCSC Part Number=C2857967, Manufacturer="FH (Guangdong Fenghua Advanced Tech)", Package=0402, ComponentLink1Description=LCSC, ComponentLink1URL=https://www.lcsc.com/product-detail/Multilayer-Ceramic-Capacitors-MLCC-SMD-SMT_FH-Guangdong-Fenghua-Advanced-Tech-0402B302K500NT_C2857967.html, Item Type=Capacitor, Manufacturer Part Number=0402B302K500NT
C21 C24: library part CC0402KRX5R6BB105, "CAP CER 1UF 10V X5R 0402", Case Code (Imperial)=0402, Case Code (Metric)=1005, Dielectric=X5R, LCSC Part Number=C106254, Manufacturer=Yageo, Max Operating Temperature=85°C, Min Operating Temperature=-55°C, Package Quantity=1, Resistor Type=Ceramic, Supplier Part Number 1=603-CC402KRX5R6BB105, Tolerance=10%, Voltage Rating=10V, Capacitance=1uF, Case/Package=0402, Category="Ceramic Capacitors", ComponentLink1Description=https://datasheet.ciiva.com/176/upy-gphc-x5r-4v-to-50v-12-176704.pdf?src-supplier=Digi-Key, ComponentLink1URL=https://datasheet.ciiva.com/176/upy-gphc-x5r-4v-to-50v-12-176704.pdf?src-supplier=Digi-Key, ComponentLink2Description=https://datasheet.ciiva.com/176/mlccorderingcode-176705.pdf?src-supplier=Digi-Key, ComponentLink2URL=https://datasheet.ciiva.com/176/mlccorderingcode-176705.pdf?src-supplier=Digi-Key, ComponentLink3Description=https://datasheet.ciiva.com/176/mlccorderingcode-176706.pdf?src-supplier=Digi-Key, ComponentLink3URL=https://datasheet.ciiva.com/176/mlccorderingcode-176706.pdf?src-supplier=Digi-Key, Construction=Flat, Depth=0.5mm, Dissipation Factor=15%, Halogen Free="Halogen Free", Height=0.5mm, Lead Free="Lead Free", Length=1mm, Manufacturer Part Number=CC0402KRX5R6BB105, Mount="Surface Mount", Number of Pins=2, Packaging="Tape and Reel", Pricing 1="1=0.11000, 10=0.05500, 50=0.05500, 100=0.03300, 500=0.02700, 1000=0.02200, 2500=0.02100, 10000=0.01800 (USD)", Radiation Hardening=No, REACH SVHC="No SVHC", RoHS=Yes, RoHS Compliant=Yes, Series=CC, Stock 1=6711367, Supplier 1=Mouser, Termination=SMD/SMT, Thickness=0.022inch, Voltage Rating (DC)=10V, Width=0.02inch
C28 C29: library part CC0603MRX5R6BB226, "CAP CER 22UF 10V X5R 0603", Case Code (Imperial)=0603, Case Code (Metric)=1608, Dielectric=X5R, LCSC Part Number=C109447, Manufacturer=Yageo, Max Operating Temperature=85°C, Min Operating Temperature=-55°C, Package Quantity=4000, Supplier Part Number 1=311-1819-1-ND, Tolerance=20%, Voltage Rating=10V, Capacitance=22uF, Case/Package=0603, Category="Ceramic Capacitors", ComponentLink1Description=http://www.mouser.com/ds/2/447/Yageo_UPY-GP_NP0_16V-to-50V_9-358835.pdf?src-supplier=Mouser, ComponentLink1URL=http://www.mouser.com/ds/2/447/Yageo_UPY-GP_NP0_16V-to-50V_9-358835.pdf?src-supplier=Mouser, ComponentLink2Description=http://www.yageo.com/documents/recent/UPY-GPHC_X5R_4V-to-50V_25.pdf?src-supplier=Digi-Key, ComponentLink2URL=http://www.yageo.com/documents/recent/UPY-GPHC_X5R_4V-to-50V_25.pdf?src-supplier=Digi-Key, Halogen Free="Halogen Free", Height=0.8mm, Item Type=Capacitor, Lead Free="Lead Free", Length=0.063inch, Manufacturer Part Number=CC0603MRX5R6BB226, Mount="Surface Mount", Packaging="Tape and Reel", Pricing 1="1=0.68000, 10=0.48000, 50=0.36300, 100=0.31610, 500=0.23416, 1000=0.19903 (USD)", RoHS=Yes, RoHS Compliant=Yes, Stock 1=19628, Supplier 1=Digi-Key, Termination=SMD/SMT, Thickness=0.035inch, Voltage Rating (DC)=10V, Weight=7.1E-05oz, Width=0.8mm
C30 C31 C32 C33 C34 C35 C36 C37: library part CGA1A2C0G1E100D030BA, "CAP CER 10PF 25V C0G 0201", Case Code (Imperial)=0201, Case Code (Metric)=0603, Dielectric=C0G, LCSC Part Number=C2168728, Manufacturer=TDK, Max Operating Temperature=125°C, Min Operating Temperature=-55°C, Package Quantity=1, Ratings=AEC-Q200, Resistor Type=Ceramic, Supplier Part Number 1=445-9023-1-ND, Voltage Rating=25V, Capacitance=10pF, Case/Package=0201, Category="Ceramic Capacitors", ComponentLink1Description=https://datasheet.ciiva.com/24220/cga1a2c0g1e100d030ba-271838-24220873.pdf?src-supplier=Mouser, ComponentLink1URL=https://datasheet.ciiva.com/24220/cga1a2c0g1e100d030ba-271838-24220873.pdf?src-supplier=Mouser, Depth=0.3mm, Height=0.3mm, Length=0.6mm, Manufacturer Part Number=CGA1A2C0G1E100D030BA, Mount="Surface Mount", Packaging="Tape and Reel", Pricing 1="1=0.11000, 10=0.07900, 50=0.04340, 100=0.03540, 500=0.02530, 1000=0.01987, 2500=0.01807, 5000=0.01662 (USD)", RoHS=Yes, RoHS Compliant=Yes, Series=CGA, Stock 1=28695, Supplier 1=Digi-Key, Termination=SMD/SMT, Thickness=0.013inch, Voltage Rating (DC)=25V, Weight=6E-06oz, Width=0.3mm
C38 C39: library part CC0402KRX5R7BB223, "CAP CER 0.022UF 16V X5R 0402", Case Code (Imperial)=0402, Case Code (Metric)=1005, Dielectric=X5R, LCSC Part Number=C541399, Manufacturer=Yageo, Max Operating Temperature=85°C, Min Operating Temperature=-55°C, Supplier Part Number 1=603-CC402KRX5R7BB223, Tolerance=10%, Voltage Rating=16V, Capacitance=22nF, Case/Package=0402, Category="Ceramic Capacitors", ComponentLink1Description=http://www.yageo.com/exep/pages/download/literatures/ProductSelectionGuide%202014_Final_2.pdf?src-supplier=Digi-Key, ComponentLink1URL=http://www.yageo.com/exep/pages/download/literatures/ProductSelectionGuide%202014_Final_2.pdf?src-supplier=Digi-Key, ComponentLink2Description=http://www.yageo.com/documents/recent/UPY-GPHC_X5R_4V-to-50V_25.pdf?src-supplier=Digi-Key, ComponentLink2URL=http://www.yageo.com/documents/recent/UPY-GPHC_X5R_4V-to-50V_25.pdf?src-supplier=Digi-Key, Halogen Free="Halogen Free", Lead Free="Lead Free", Length=0.039inch, Manufacturer Part Number=CC0402KRX5R7BB223, Mount="Surface Mount", Packaging="Tape and Reel", Pricing 1="1=0.10000, 10=0.05600, 50=0.05600, 100=0.02500, 1000=0.01400, 10000=0.01000 (USD)", RoHS=Yes, RoHS Compliant=Yes, Stock 1=31160, Supplier 1=Mouser, Thickness=0.022inch, Voltage Rating (DC)=16V, Width=0.02inch
C40: library part CC0201KRX5R8BB102, "CAP CER 1000PF 25V X5R 0201", Case/Package=0201, Dielectric=X5R, LCSC Part Number=C541213, Manufacturer=Yageo, Max Operating Temperature=85°C, Min Operating Temperature=-55°C, Supplier Part Number 1=603-CC0201KR8BB102, Tolerance=10%, Voltage Rating=25V, Capacitance=1nF, Category="Ceramic Capacitors", ComponentLink1Description=http://www.yageo.com/documents/recent/UPY-GPHC_X5R_4V-to-50V_25.pdf?src-supplier=Digi-Key, ComponentLink1URL=http://www.yageo.com/documents/recent/UPY-GPHC_X5R_4V-to-50V_25.pdf?src-supplier=Digi-Key, ComponentLink2Description=https://www.yageo.com/upload/media/product/productsearch/datasheet/mlcc/UPY-GPHC_X5R_4V-to-50V_25.pdf?src-supplier=Digi-Key, ComponentLink2URL=https://www.yageo.com/upload/media/product/productsearch/datasheet/mlcc/UPY-GPHC_X5R_4V-to-50V_25.pdf?src-supplier=Digi-Key, ComponentLink3Description=http://www.yageo.com/exep/pages/download/literatures/ProductSelectionGuide%202014_Final_2.pdf?src-supplier=Digi-Key, ComponentLink3URL=http://www.yageo.com/exep/pages/download/literatures/ProductSelectionGuide%202014_Final_2.pdf?src-supplier=Digi-Key, Halogen Free="Halogen Free", Lead Free="Lead Free", Length=0.024inch, Manufacturer Part Number=CC0201KRX5R8BB102, Mount="Surface Mount", Packaging="Tape and Reel", Pricing 1="1=0.10000, 10=0.02600, 50=0.02600, 100=0.01100, 1000=0.00700, 10000=0.00500 (USD)", RoHS=Yes, RoHS Compliant=Yes, Stock 1=54104, Supplier 1=Mouser, Thickness=0.013inch, Voltage Rating (DC)=25V, Width=0.012inch
D1: "8.6A 69.4V 47.8V 43V Unidirectional SMB(DO-214AA) TVS ROHS", LCSC Part=C10222, Manufacturer=RUILON, Package=SMB, ComponentLink1Description=LCSC, ComponentLink1URL=https://lcsc.com/product-detail/TVS_RUILON-Shenzhen-Ruilongyuan-Elec-SMBJ43A_C10222.html, Item Type=Diode, Manufacturer Part Number=SMBJ43A
D2: "DIODE SCHOTTKY 60V 5A SMA", LCSC Par Number=C65009, Manufacturer=MDD, ComponentLink1Description=LCSC, ComponentLink1URL=https://www.lcsc.com/product-detail/Schottky-Barrier-Diodes-SBD_MDD-Microdiode-Electronics-SS56_C65009.html, Iterm Type=Diode, Manufacturer Part Number=SS56
D3: "SOD-523 Schottky Barrier Diodes (SBD) ROHS", Manufacturer="Tak Cheong", ComponentLink1Description=LCSC, ComponentLink1URL=https://lcsc.com/product-detail/Schottky-Barrier-Diodes-SBD_Tak-Cheong-MSK4010_C968723.html, Manufacturer Part No=MSK4010, Pakage=SOD-523
D5: "Schottky Barrier Diode SK36, DO-214AB, 3A/60V", Average Rectified Current=3A, Case/Package=SMC, Forward Voltage=750mV, LCSC Part Number=C16015, Manufacturer="ON Semiconductor / Fairchild", Max Forward Surge Current (Ifsm)=100A, Max Operating Temperature=150°C, Max Repetitive Reverse Voltage (Vrrm)=60V, Max Reverse Current=500uA, Min Operating Temperature=-55°C, Package Quantity=3000, Power Dissipation=2.27W, Supplier Part Number 1=9034425P, Category="Schottky Diodes", ComponentLink1Description=https://datasheet.ciiva.com/4714/ss36-197193-4714610.pdf?src-supplier=Mouser, ComponentLink1URL=https://datasheet.ciiva.com/4714/ss36-197193-4714610.pdf?src-supplier=Mouser, ComponentLink2Description=https://datasheet.ciiva.com/16889/ss36-16889545.pdf?src-supplier=Future+Electronics, ComponentLink2URL=https://datasheet.ciiva.com/16889/ss36-16889545.pdf?src-supplier=Future+Electronics, ComponentLink3Description=https://datasheet.ciiva.com/920/ss34-920433.pdf?src-supplier=Digi-Key, ComponentLink3URL=https://datasheet.ciiva.com/920/ss34-920433.pdf?src-supplier=Digi-Key, ComponentLink4Description=https://datasheet.ciiva.com/920/ss34-920434.pdf?src-supplier=Digi-Key, ComponentLink4URL=https://datasheet.ciiva.com/920/ss34-920434.pdf?src-supplier=Digi-Key, ComponentLink5Description=https://datasheet.ciiva.com/920/ss34-920435.pdf?src-supplier=Digi-Key, ComponentLink5URL=https://datasheet.ciiva.com/920/ss34-920435.pdf?src-supplier=Digi-Key, Current=3A, Current Rating=3A, Element Configuration=Single, Forward Current=3A, Item Type=Diode, Lead Free="Lead Free", Manufacturer Part Number=SS36, Max Reverse Leakage Current=500uA, Max Reverse Voltage (DC)=60V, Max Surge Current=100A, Mount="Surface Mount", Number of Pins=2, Output Current=3A, Packaging="Tape and Reel", Peak Non-Repetitive Surge Current=100A, Polarity=Standard, Pricing 1="100=0.43800, 500=0.34200, 1000=0.27800, 3000=0.25000 (GBP)", Radiation Hardening=No, Reach SVHC Compliant=Yes, RoHS=Yes, RoHS Compliant=Yes, Series=-, Stock 1=100, Supplier 1=Rs, Voltage=60V, Voltage Rating (DC)=60V
J1: "P=2.54mm Female Headers,SMD,ROHS", Manufacturer=RTLECS, Package=Custom, Manufacturer Part No=PHF254SMD-x
J2 J3: "Through Hole Ethernet Connectors/Modular Connectors (RJ45 RJ11) ROHS", LCSC Part Number=C34677, Manufacturer=HANRUN, Package=Custom, ComponentLink1Description=LCSC, ComponentLink1URL=https://lcsc.com/product-detail/Ethernet-Connectors-Modular-Connectors-RJ45-RJ11_HANRUN-Zhongshan-HanRun-Elec-HY951180A_C34677.html, Item Type="RJ45 Connector", Manufacturer Part Number=HY951180A
J4: "CONN HEADER 4 POS 2.54mm SMD", Current Rating="3 A", Manufacturer=RTLECS, Connector Type="Pin header Male SMT", Pitch=2.54
L1: library part DFE322512F-4R7M=P2, "FIXED IND 4.7UH 1.6A 157MOHM SMD", LCSC Part Number=C703083, Manufacturer=Murata, Manufacturer Part Number=DFE322512F-4R7M=P2, Supplier Part Number 1=490-DFE322512F-4R7M=P2CT-ND, Category="Fixed Inductors", Item Type=Inductor, Pricing 1="1=0.61, 10=0.533, 25=0.4952, 50=0.4188, 100=0.3808, 250=0.35792, 500=0.31984, 1000=0.25892 (USD)", RoHS=Yes, RoHS Compliant=Yes, Stock 1=4687, Supplier 1=Digi-Key
L2: library part PSPMAA0605H-680M-IGF, "2A 68uH ±20% 2.5A SMD,6.6x7.1mm Power Inductors ROHS", LCSC Part Number=C2983094, Manufacturer="PROD Tech", Package=SMD,6.6x7.1mm, ComponentLink1Description=LCSC, ComponentLink1URL=https://www.lcsc.com/product-detail/Power-Inductors_PROD-Tech-PSPMAA0605H-680M-IGF_C2983094.html, Item Type=Inductor, Manufacturer Part Number=PSPMAA0605H-680M-IGF
P1: "Straight 2.54mm Black Brass 1x4P Plugin,P=2.54mm Pin Headers ROHS", LCSC Part Number=C124378, Manufacturer=Ckmtw, ComponentLink1Description=LCSC, ComponentLink1URL=https://www.lcsc.com/product-detail/Pin-Headers_Ckmtw-Shenzhen-Cankemeng-B-2100S04P-A110_C124378.html, Item Type=Header, Manufacturer Part Number=B-2100S04P-A110
P2 P3: "CONN HEADER VERT 2POS 2.54MM", Color=Green, Current Rating=3A, Flammability Rating="UL94 V-0", High Temperature Housing=No, Manufacturer="TE Connectivity", Manufacturer Part Number=8266292, Max Operating Temperature=105°C, Min Operating Temperature=-65°C, Package Quantity=3000, Supplier Part Number 1=1361864, Board Standoff="No (Without)", Category="Board to Board Connectors", ComponentLink1Description=https://datasheet.ciiva.com/11746/0900766b80d7c358-11746248.pdf?src-supplier=RSComponents, ComponentLink1URL=https://datasheet.ciiva.com/11746/0900766b80d7c358-11746248.pdf?src-supplier=RSComponents, ComponentLink2Description=https://datasheet.ciiva.com/30224/8266292-30224019.pdf?src-supplier=Onlinecomponents.com, ComponentLink2URL=https://datasheet.ciiva.com/30224/8266292-30224019.pdf?src-supplier=Onlinecomponents.com, ComponentLink3Description=https://datasheet.ciiva.com/29369/001094754-da-01-en-stiftleiste-1-reihig-0-0826629-2-29369600.pdf?src-supplier=Conrad, ComponentLink3URL=https://datasheet.ciiva.com/29369/001094754-da-01-en-stiftleiste-1-reihig-0-0826629-2-29369600.pdf?src-supplier=Conrad, ComponentLink4Description=https://datasheet.ciiva.com/6857/eng-cd-826629-aa-basefilename-6857135.pdf?src-supplier=Digi-Key, ComponentLink4URL=https://datasheet.ciiva.com/6857/eng-cd-826629-aa-basefilename-6857135.pdf?src-supplier=Digi-Key, ComponentLink5Description=https://datasheet.ciiva.com/14120/eh826629-draw-14120837.pdf?src-supplier=Distrelec, ComponentLink5URL=https://datasheet.ciiva.com/14120/eh826629-draw-14120837.pdf?src-supplier=Distrelec, Connector Type=Plug,Header,Pin, Contact Gender=Male, Contact Material=Bronze, Contact Mating Length=6.7mm, Contact Plating=Gold,Tin, Contact Post Length=0.1259inch, Contact Protection="No (Without)", Contact Shape=Square, Contact Type="Male Pin", Depth=2.5mm, ELV=Compliant, Gasket="No (Without)", Gender=Male, High Speed Serial Data Connector=No, Housing Color=Green, Housing Material=PBT, Keyed=No, Lead Free="Lead Free", Length=5.08mm, Mating Alignment="No (Without)", Mating Connector Lock="No (Without)", Mount="Straddle Mount", Number of Contacts=2, Number of Positions=2, Number of Rows=1, Orientation=Straight, Packaging=Carton, PCB Mount Retention=Without, PCB Mounting Orientation=Vertical, Pitch=2.54mm, Plating Thickness=0.8um, Radiation Hardening=No, REACH SVHC="No SVHC", RoHS=Yes, Row Spacing=2.54mm, Selectively Loaded="No (Without)", Series="AMPMODU MOD II", Stabilizers="No (Without)", Strain Relief="No (Without)", Supplier 1=RSComponents, Termination="Through Hole"
P4 P5 P6 P7 P8 P9: library part "TEST POINT", "Test Point ON"
P10 P11 P12 P13: "Test Point ON"
Q1: "MOSFET N-CH 20V 4.2A SOT23", Case/Package=SOT-23, Continuous Drain Current (ID)=4.2A, Drain to Source Breakdown Voltage=20V, Drain to Source Resistance=45mR, Gate to Source Voltage (Vgs)=12V, Input Capacitance=740pF, Manufacturer="International Rectifier", Max Operating Temperature=150°C, Max Power Dissipation=1.25W, Min Operating Temperature=-55°C, Package Quantity=3000, Supplier Part Number 1=11X6741, Threshold Voltage=1.2V, Category=MOSFETs, ComponentLink1Description=https://datasheet.ciiva.com/36526/1563649-36526014.pdf?src-supplier=Jameco, ComponentLink1URL=https://datasheet.ciiva.com/36526/1563649-36526014.pdf?src-supplier=Jameco, ComponentLink2Description=https://datasheet.ciiva.com/16425/irlml2502pbf-16425943.pdf?src-supplier=Future+Electronics, ComponentLink2URL=https://datasheet.ciiva.com/16425/irlml2502pbf-16425943.pdf?src-supplier=Future+Electronics, ComponentLink3Description=https://datasheet.ciiva.com/6156/irlml2502-6156070.pdf?src-supplier=Farnell, ComponentLink3URL=https://datasheet.ciiva.com/6156/irlml2502-6156070.pdf?src-supplier=Farnell, ComponentLink4Description=https://datasheet.ciiva.com/7935/irlml2502-7935685.pdf?src-supplier=Element14, ComponentLink4URL=https://datasheet.ciiva.com/7935/irlml2502-7935685.pdf?src-supplier=Element14, Current Rating=4.2A, Drain to Source Voltage (Vdss)=20V, Drain-source On Resistance-Max=45mR, Dual Supply Voltage=20V, Element Configuration=Single, Fall Time=26ns, Height=1.02mm, Lead Free="Lead Free", Length=2.8mm, Manufacturer Part Number=IRLML2502TRPBF, Mount="Surface Mount", Nominal Vgs=1.2V, Number of Elements=1, Number of Pins=3, On-State Resistance=45mR, Packaging="Tape and Reel", Power Dissipation=1.25W, Radiation Hardening=No, Rds On Max=45mR, REACH SVHC="No SVHC", Rise Time=10ns, RoHS=Yes, Supplier 1=Newark, Termination=SMD/SMT, Turn-Off Delay Time=54ns, Turn-On Delay Time=7.5ns, Voltage Rating (DC)=20V, Width=1.4mm
R1 R5: library part RC0201FR-0710KL, "RES SMD 10K OHM 1% 1/20W 0201", LCSC Part Number=C106225, Manufacturer=Yageo, Package=0201, ComponentLink7Description=LCSC, ComponentLink7URL=https://www.lcsc.com/product-detail/Chip-Resistor-Surface-Mount_YAGEO-RC0201FR-0710KL_C106225.html, Item Type=Resistor, Manufacturer Part Number=RC0201FR-0710KL
R2: library part RC0603FR-0710RL, "RES SMD 10 OHM 1% 1/10W 0603", Case Code (Imperial)=0603, Case Code (Metric)=1608, LCSC Part Number=C109318, Manufacturer=Yageo, Max Operating Temperature=155°C, Min Operating Temperature=-55°C, Power Rating=100mW, Supplier Part Number 1=311-10.0HRDKR-ND, Temperature Coefficient=200ppm/°C, Tolerance=1%, Voltage Rating=50V, Case/Package=0603, ComponentLink1Description=http://www.farnell.com/datasheets/1868787.pdf?src-supplier=Element14, ComponentLink1URL=http://www.farnell.com/datasheets/1868787.pdf?src-supplier=Element14, ComponentLink2Description=http://www.yageo.com/documents/recent/PYu-RC0603_51_RoHS_L_4.pdf?src-supplier=Avnet, ComponentLink2URL=http://www.yageo.com/documents/recent/PYu-RC0603_51_RoHS_L_4.pdf?src-supplier=Avnet, ComponentLink3Description=http://documents.rs-components.com/techlib://itc_doclist_GB.htm?stockno=5048984&src-supplier=RSComponents, ComponentLink3URL=http://documents.rs-components.com/techlib://itc_doclist_GB.htm?stockno=5048984&src-supplier=RSComponents, ComponentLink4Description=http://www.yageo.com/documents/recent/PYu-RC0603_51_RoHS_L_4.pdf?src-supplier=Avnet+Europe, ComponentLink4URL=http://www.yageo.com/documents/recent/PYu-RC0603_51_RoHS_L_4.pdf?src-supplier=Avnet+Europe, Composition="Thick Film", Contact Plating=Tin,Matte, Depth=0.8mm, Height=0.45mm, Item Type=Resistor, Lead Free="Lead Free", Length=1.6mm, Manufacturer Part Number=RC0603FR-0710RL, Military Standard=Not, Number of Pins=2, Packaging="Tape and Reel", Pricing 1="1=0.1, 10=0.046, 100=0.0187, 1000=0.0084, 2500=0.00729 (USD)", Radiation Hardening=No, REACH SVHC="No SVHC", Resistance=10R, Stock 1=10836596, Supplier 1=Digi-Key, Termination=SMD/SMT, Voltage Rating (DC)=50V, Width=0.8mm
R3 R4: library part FRL1210JR110TS, "500mW ±5% 110mΩ 1210 Chip Resistor - Surface Mount ROHS", LCSC Part Number=C3000678, Manufacturer=FOJAN, Package=1210, ComponentLink1Description=LCSC, ComponentLink1URL=https://www.lcsc.com/product-detail/Chip-Resistor-Surface-Mount_FOJAN-FRL1210JR110TS_C3000678.html, Item Type=Resistor, Manufacturer Part Number=FRL1210JR110TS
R6 R11: library part RC0201FR-07105KL, "RES 105K OHM 1% 1/20W 0201", Case Code (Imperial)=0201, Case Code (Metric)=0603, LCSC Part Number=C273297, Manufacturer=Yageo, Max Operating Temperature=125°C, Max Power Dissipation=50mW, Min Operating Temperature=-55°C, Package Quantity=1, Supplier Part Number 1=311-105KMCT-ND, Temperature Coefficient=200ppm/°C, Tolerance=1%, Case/Package=0201, Category="Chip SMD Resistors", ComponentLink1Description=https://datasheet.ciiva.com/2467/pyu-r-int-thick-7-2467119.pdf?src-supplier=Digi-Key, ComponentLink1URL=https://datasheet.ciiva.com/2467/pyu-r-int-thick-7-2467119.pdf?src-supplier=Digi-Key, ComponentLink2Description=https://datasheet.ciiva.com/2467/pyu-r-int-thick-7-2467120.pdf?src-supplier=Digi-Key, ComponentLink2URL=https://datasheet.ciiva.com/2467/pyu-r-int-thick-7-2467120.pdf?src-supplier=Digi-Key, ComponentLink3Description=https://datasheet.ciiva.com/2467/pyu-r-int-thick-7-2467118.pdf?src-supplier=Digi-Key, ComponentLink3URL=https://datasheet.ciiva.com/2467/pyu-r-int-thick-7-2467118.pdf?src-supplier=Digi-Key, Features="Moisture Resistant", Height=0.01inch, Item Type=Resistor, Length=0.024inch, Manufacturer Part Number=RC0201FR-07105KL, Number of Terminations=2, Packaging="Cut Tape", Pricing 1="1=0.1, 10=0.027, 100=0.0143, 1000=0.00854, 2500=0.00712, 5000=0.00629 (USD)", RoHS=Yes, RoHS Compliant=Yes, Series=RC, Stock 1=62124, Supplier 1=Digi-Key, Width=0.012inch